# Altium PCB adau1979-fpga.PcbDoc (part 1 of 10)
Units mil, origin at the board's own origin, x right, y up, seen from the top; angles counter-clockwise.
Board outline 7874.02 x 9055.12 mil, 4 copper layers (Top Layer, GND, POWER, Bottom Layer), stack 23.756 mil thick; 636 components, 457 nets, 2015 pads, 4184 vias.
Unrouted connection lines stored in the file: 10.
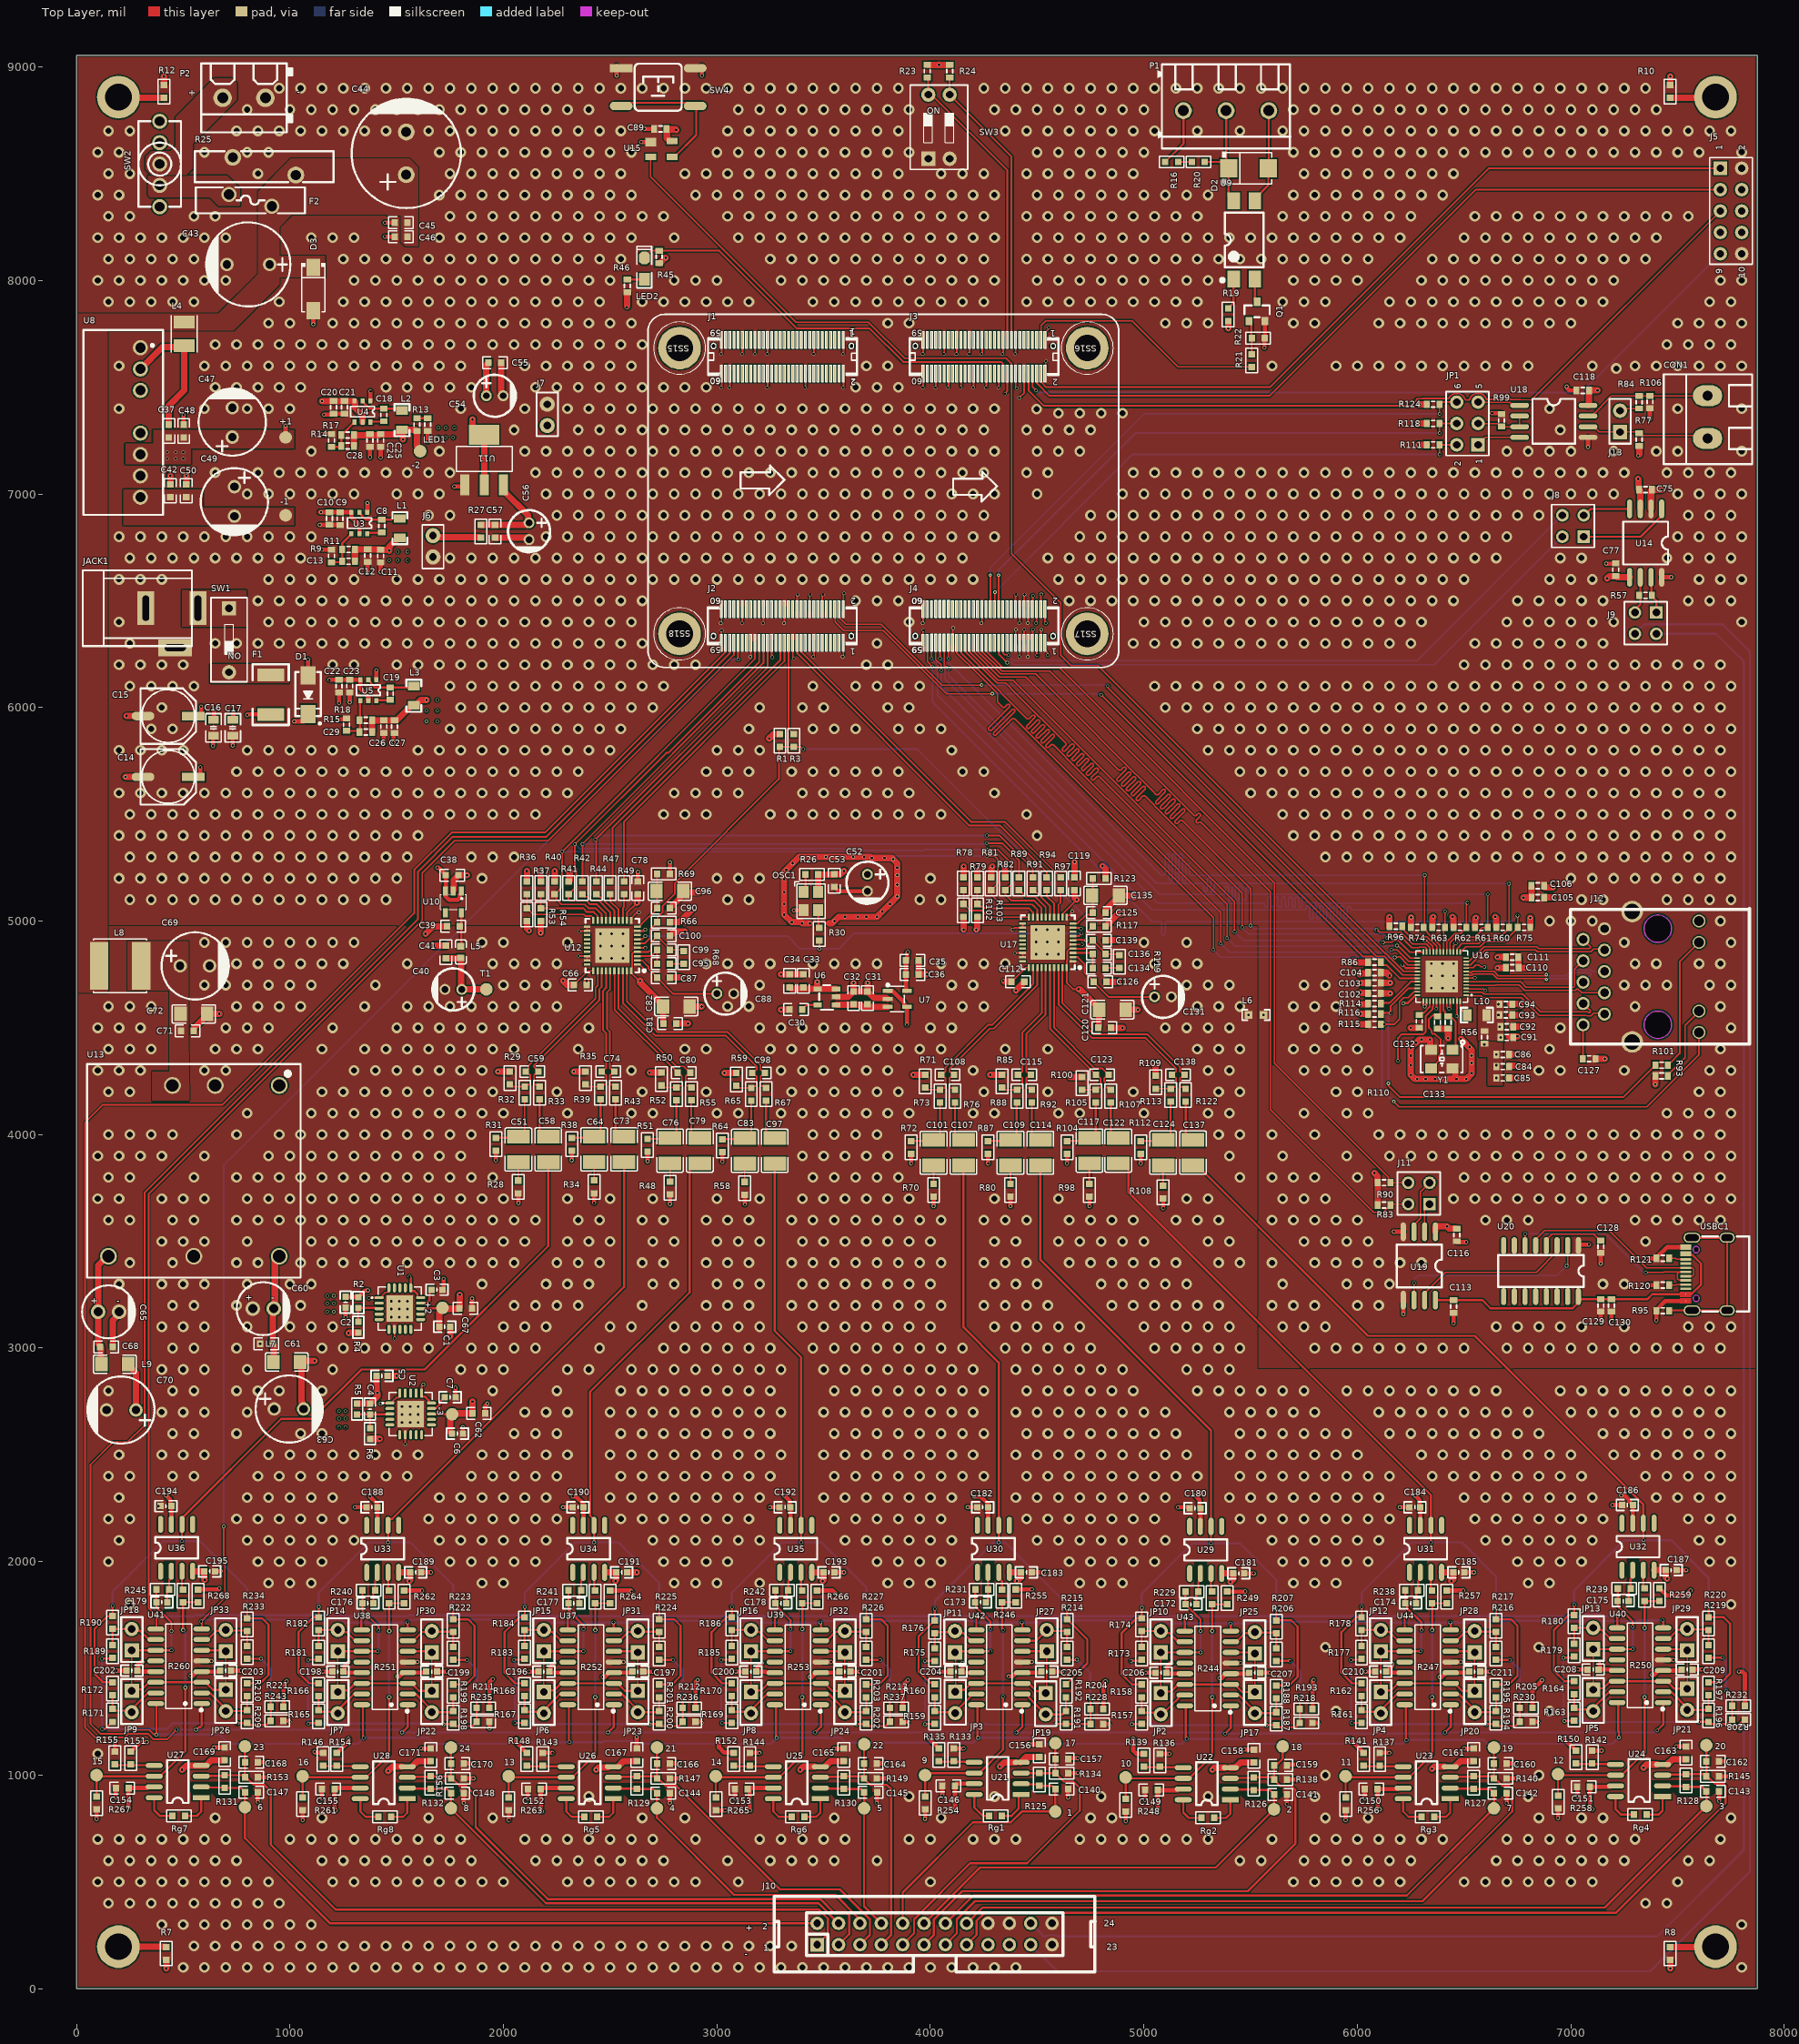
[diagram p0: Top Layer view]
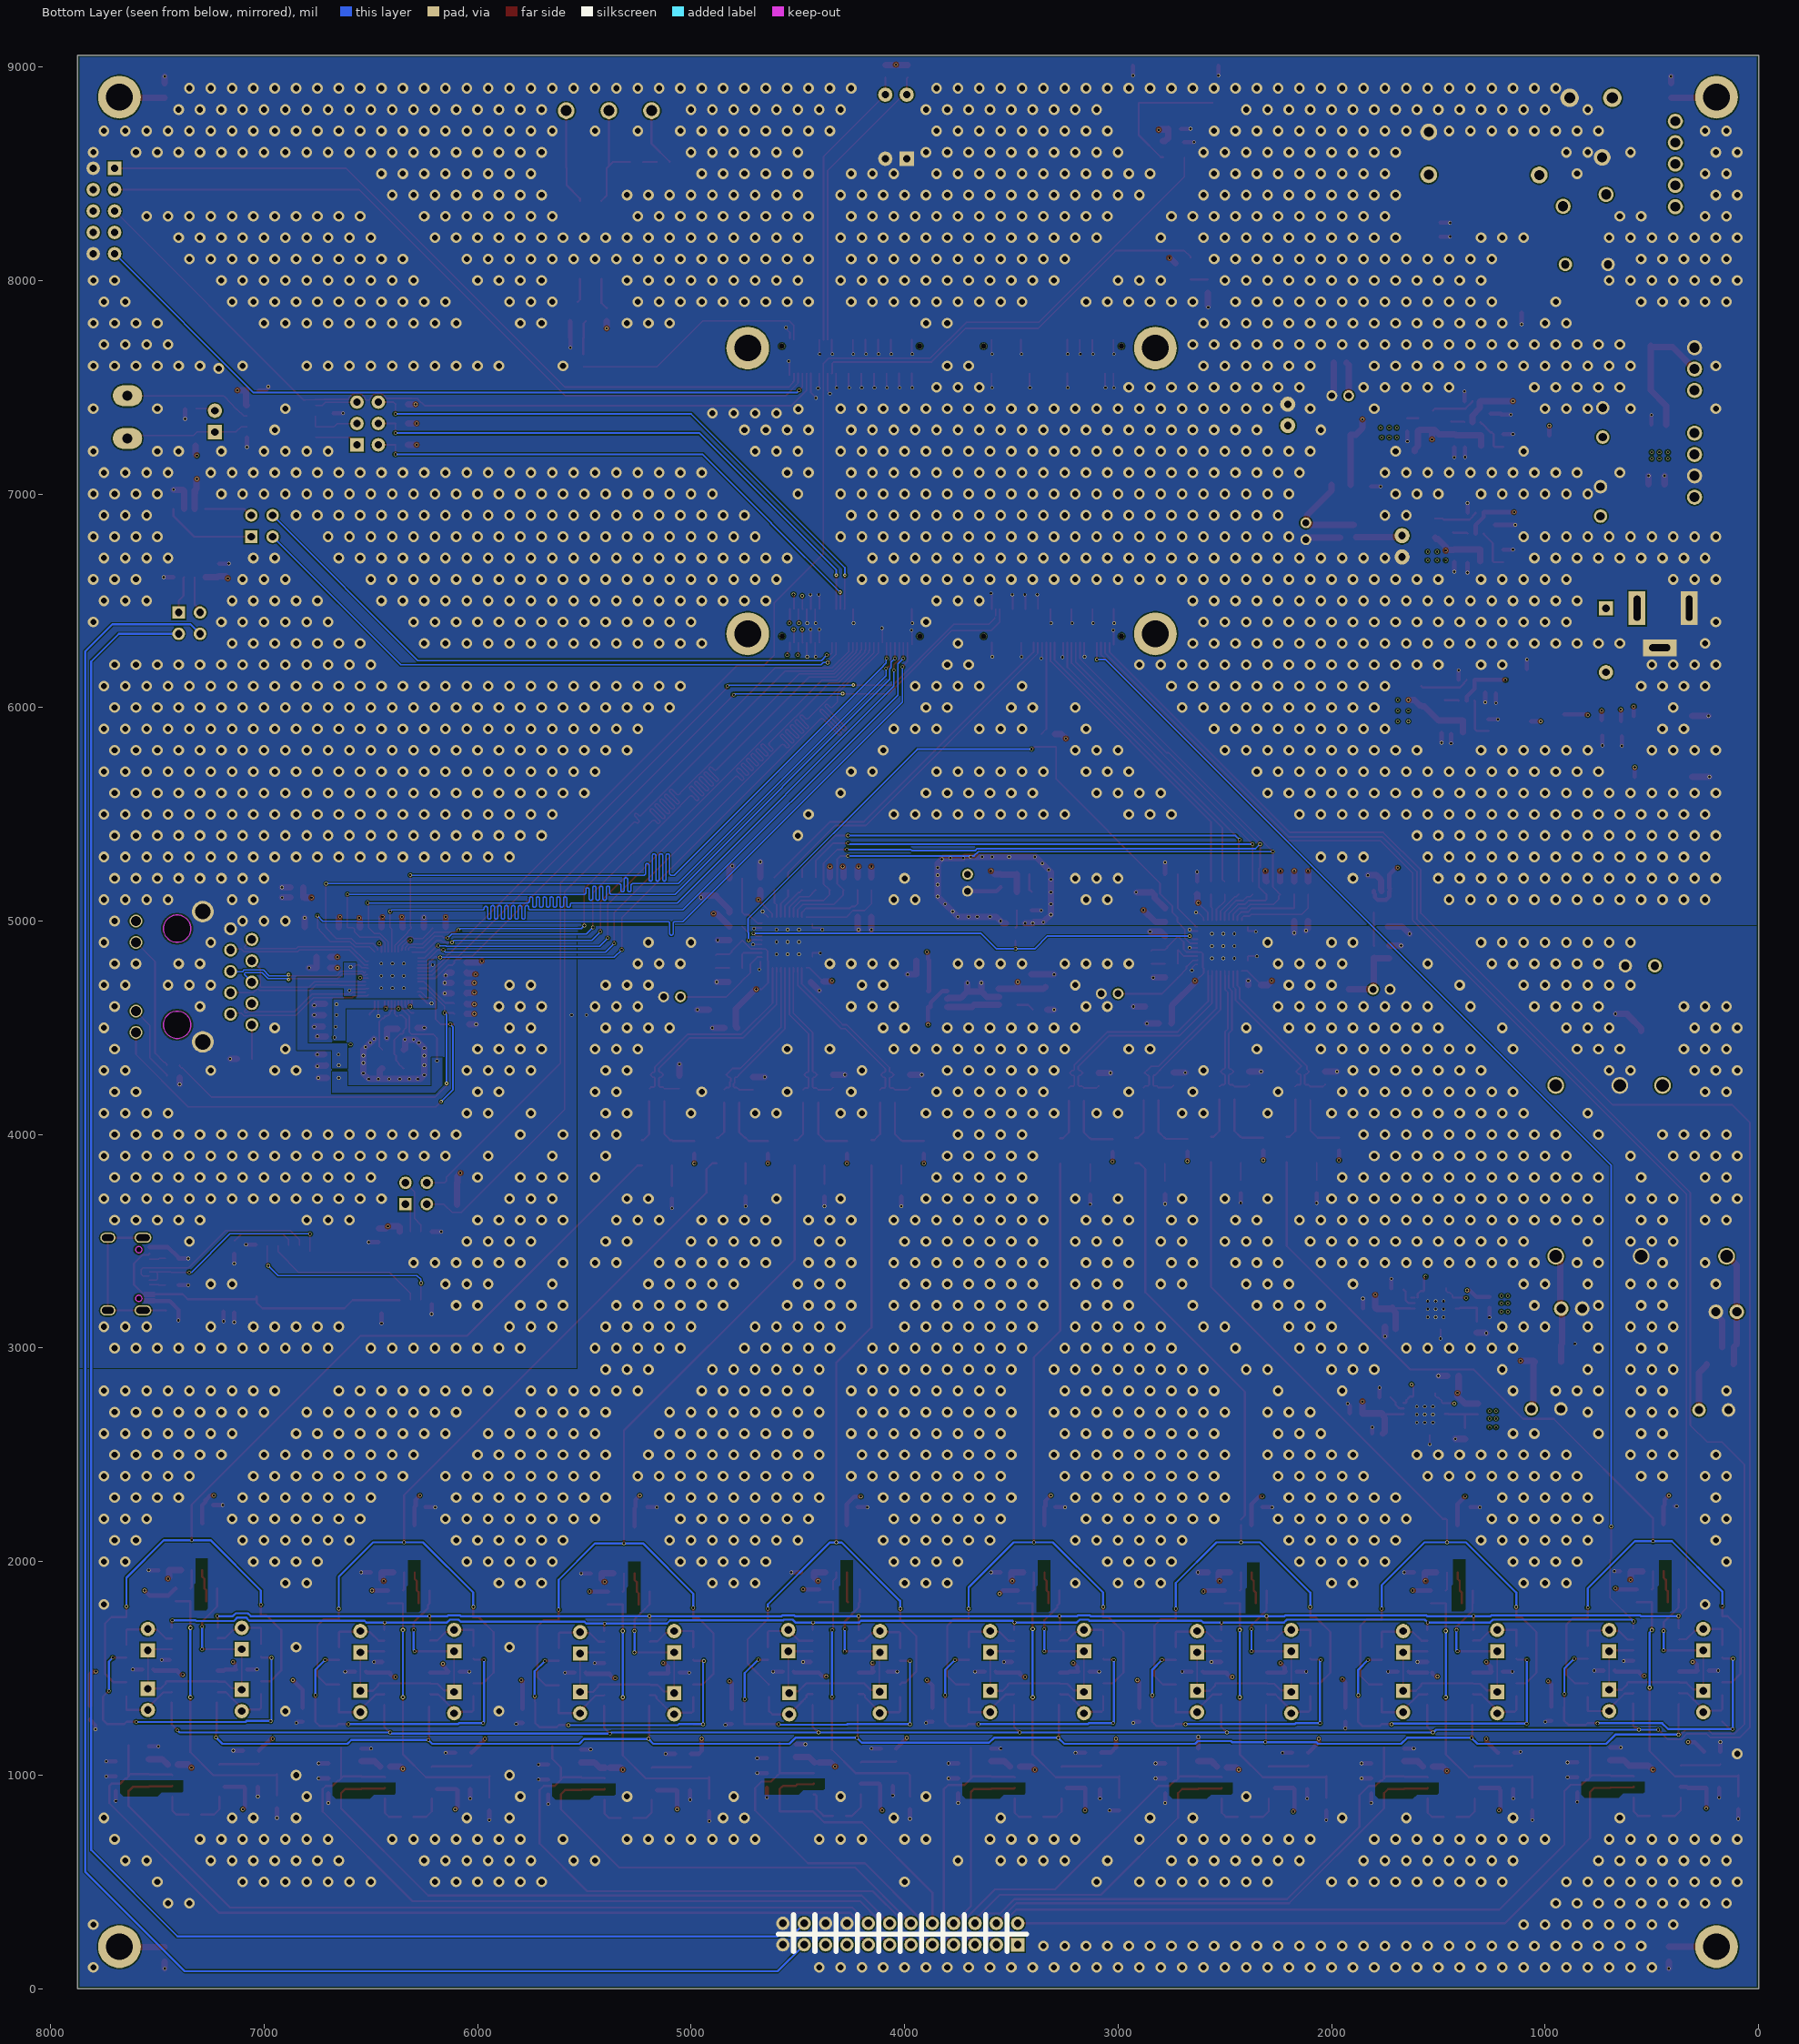
[diagram p1: Bottom Layer view, seen from below]
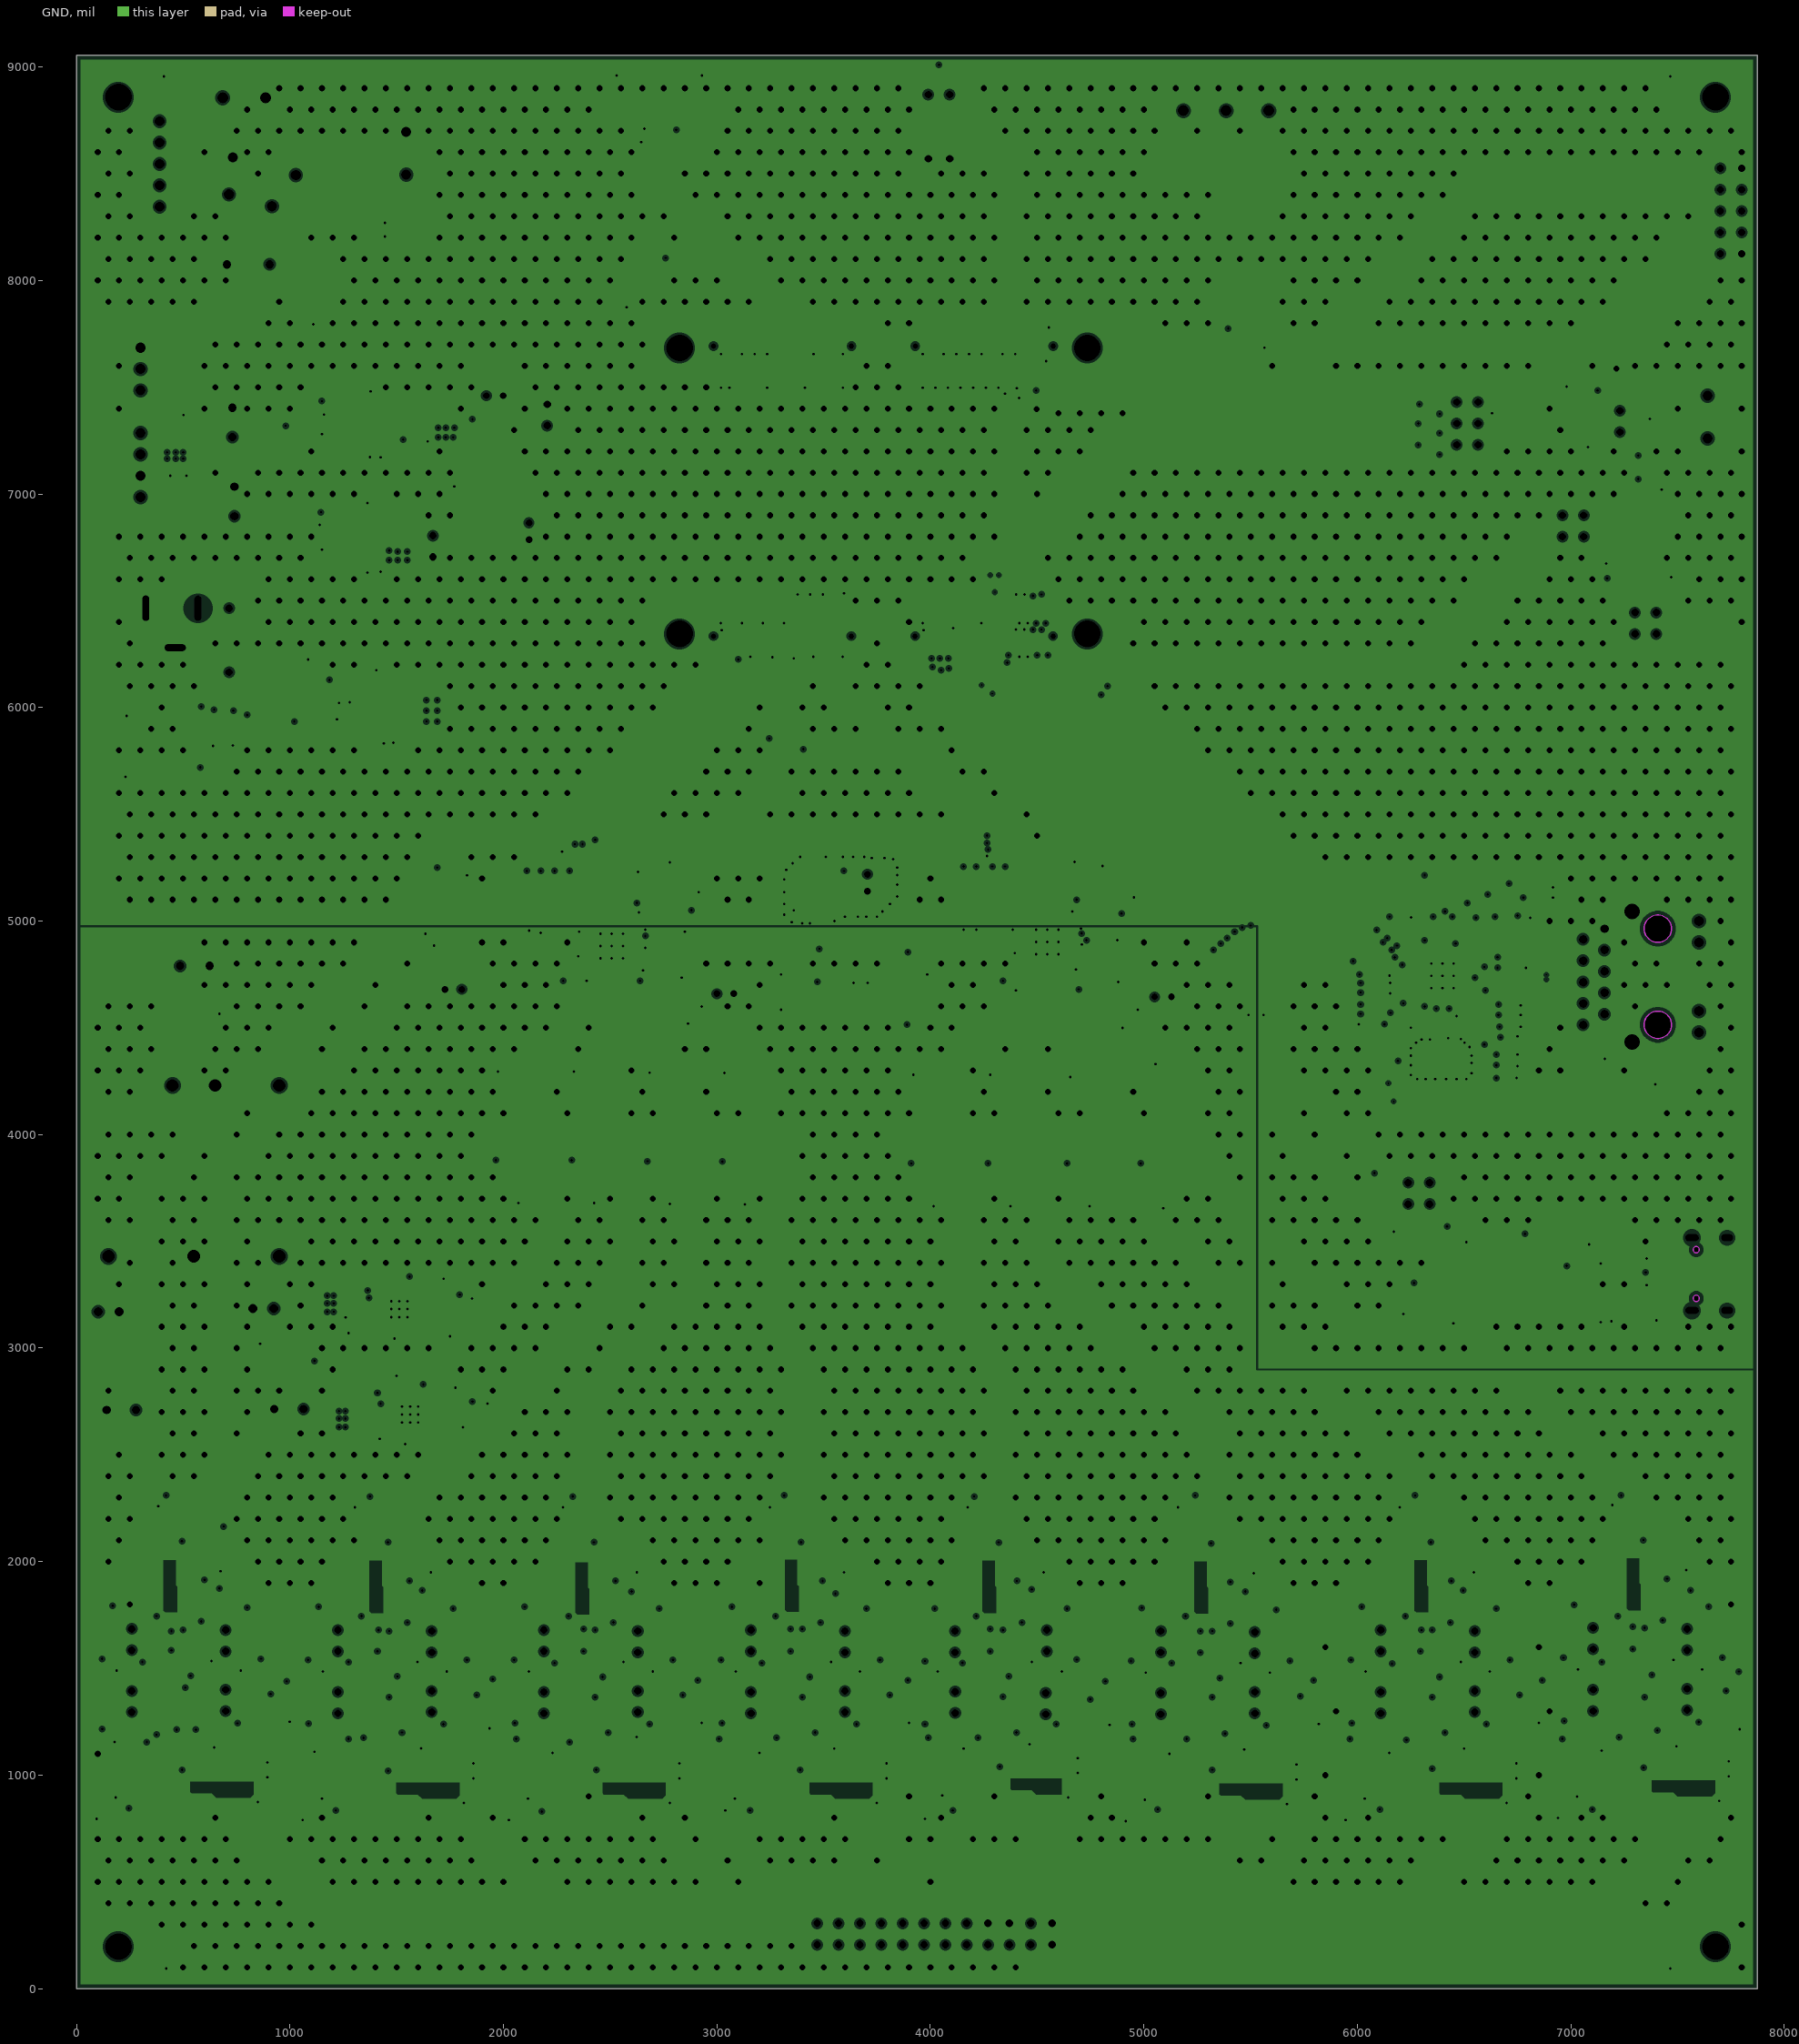
[diagram p2: GND, clearances drawn from the general rule]
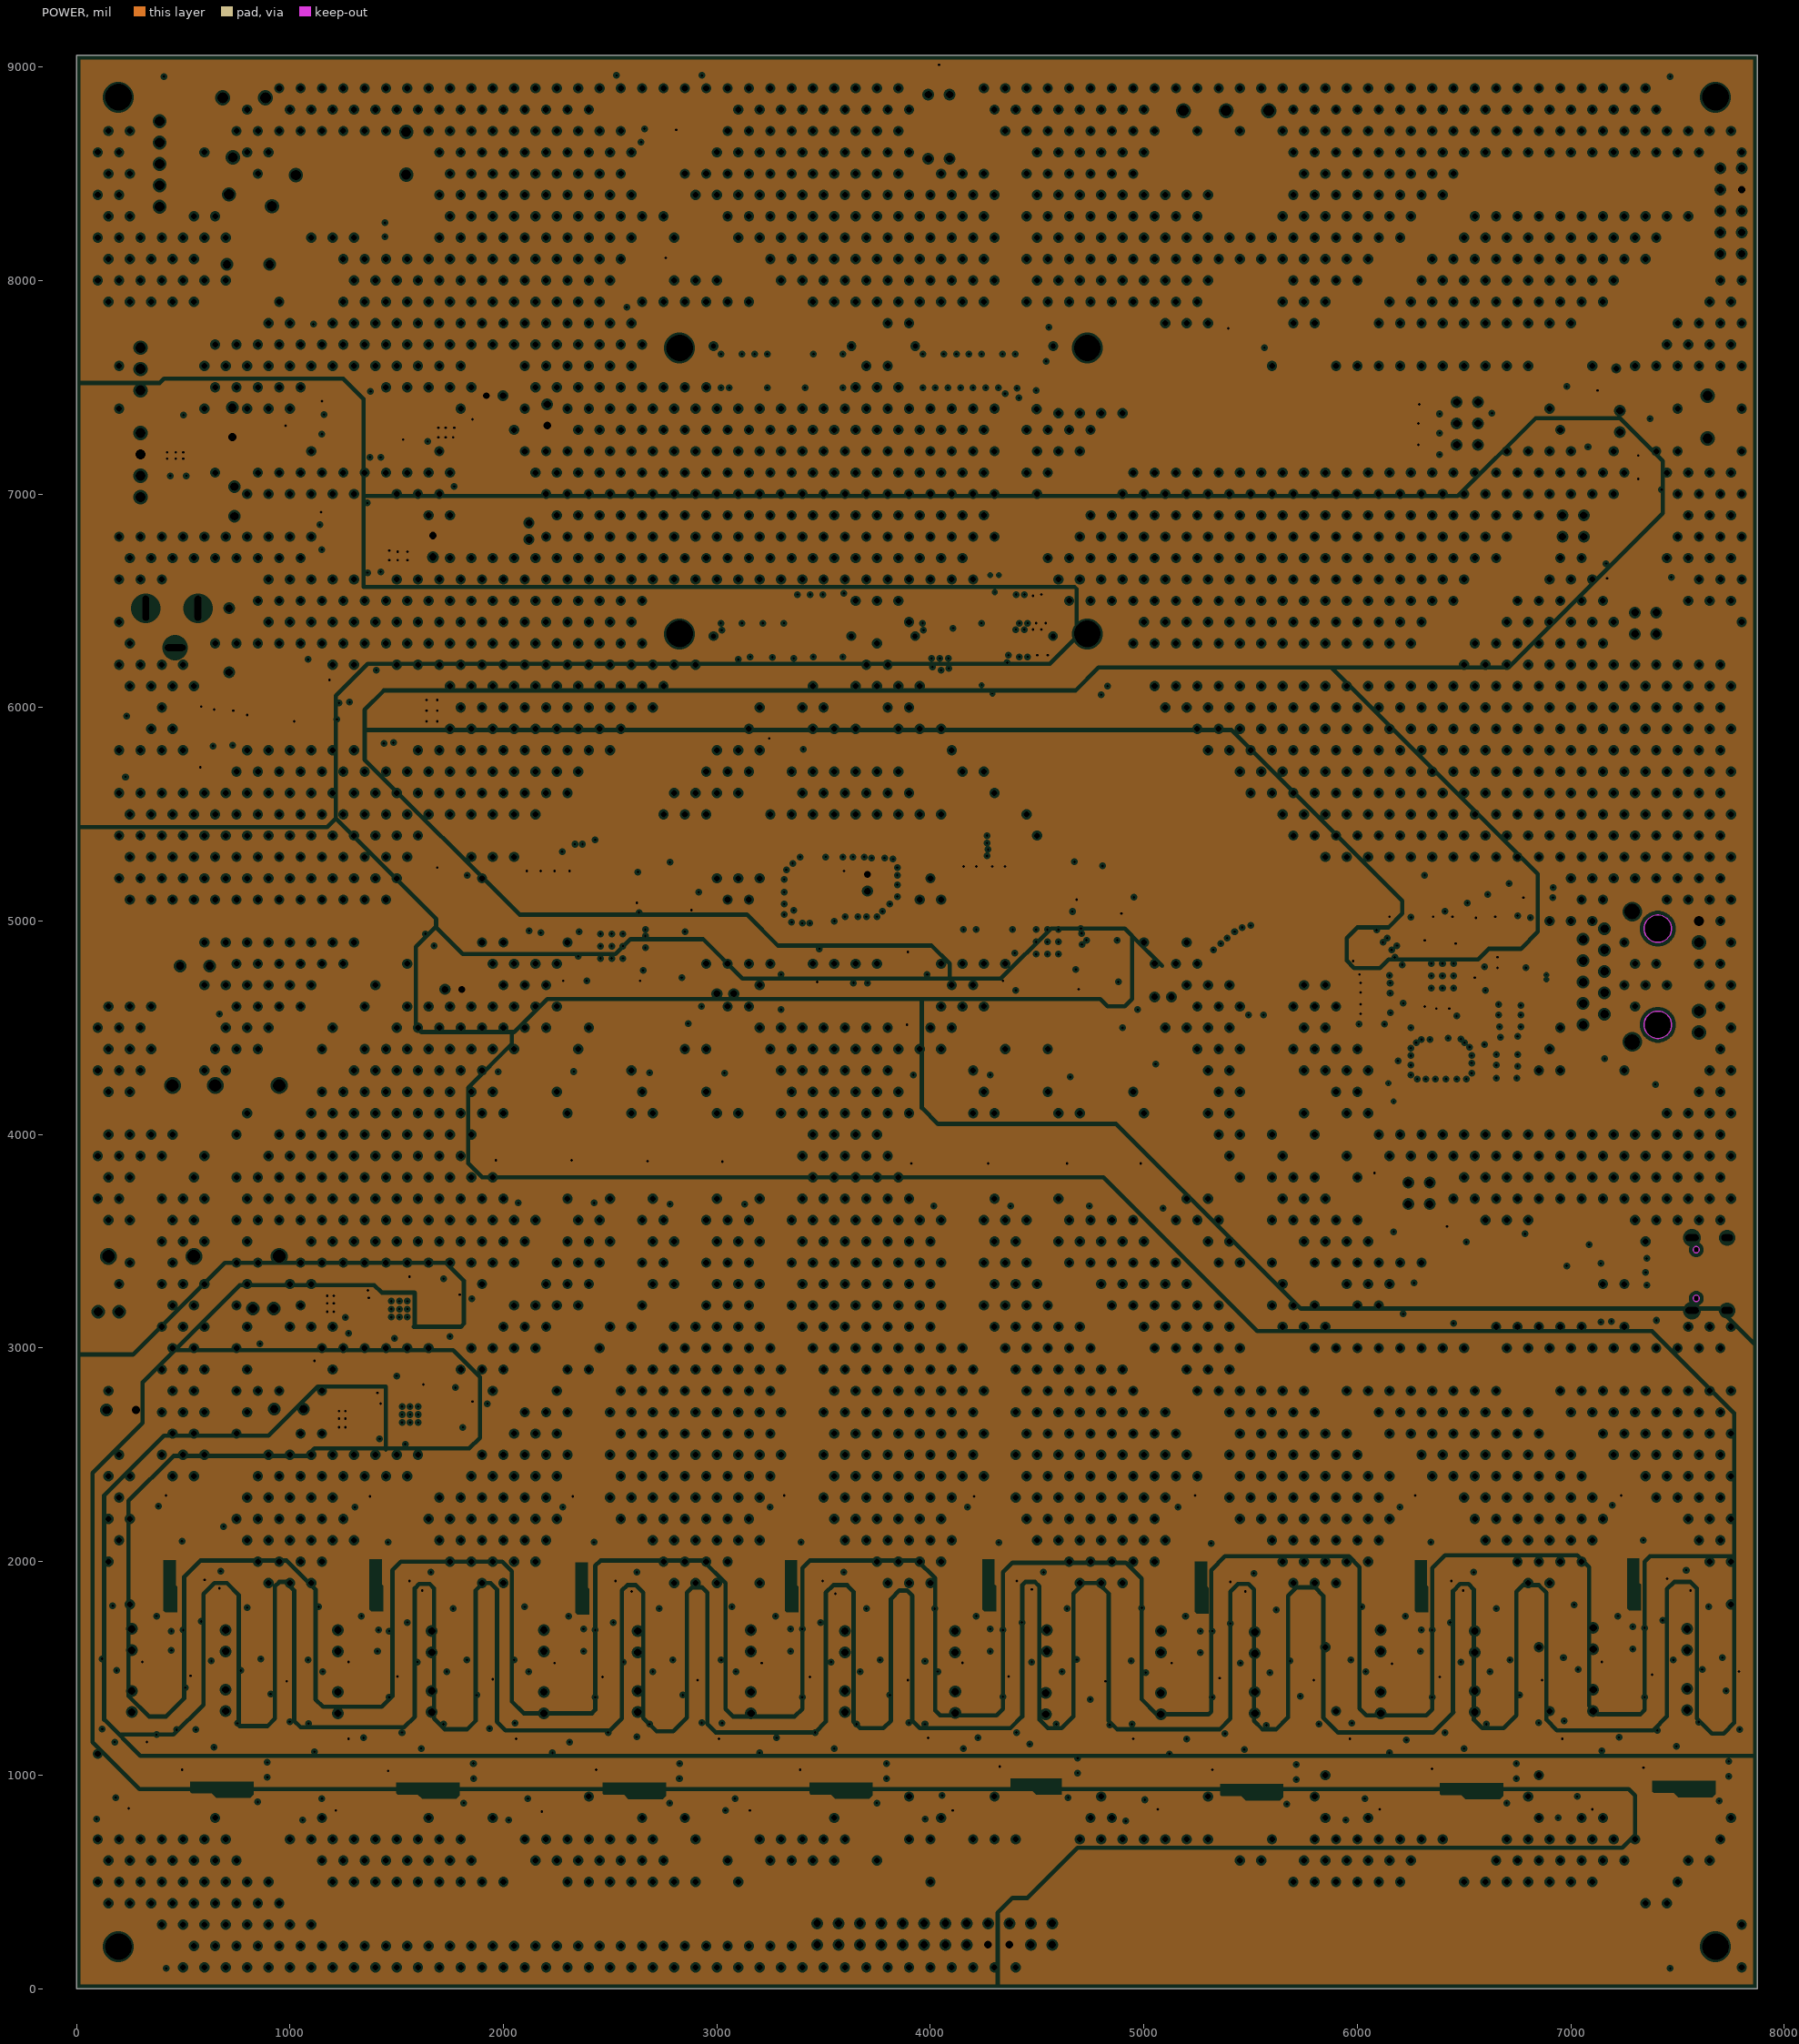
[diagram p3: POWER, clearances drawn from the general rule]

## Layer stack, top to bottom
Top Solder: solder mask 0.4, Solder Resist, Dk 3.5
Top Layer: signal copper 1.4
Dielectric 2: prepreg 2.8, PP-006, Dk 4.1
GND: plane copper 1.378, net (Multiple Nets)
Dielectric 1: dielectric 12.6, FR-4, Dk 4.8
POWER: plane copper 1.378, net (Multiple Nets)
Dielectric 3: prepreg 2.8, PP-006, Dk 4.1
Bottom Layer: signal copper 1.4
Bottom Solder: solder mask 0.4, Solder Resist, Dk 3.5

## Board outline
0,0 0,9055.12 7874.02,9055.12 7874.02,0

## Design rules (kind name [scope] priority, off if disabled: settings)
AssemblyTestPointUsage 2284ea57-458d-47d5-8d41-4f903e3b5c5f [All] p1:
AssemblyTestpoint 0b7be17f-e431-45da-92ab-2d8fefdc81cb [All] p1: testpointundercomponent=TRUE minsize=40 maxsize=100 preferedsize=60 minholesize=0 maxholesize=40 preferedholesize=32 testpointgrid=1 usegrid=TRUE gridtolerance=0.01 allowsidetop=TRUE allowsidebottom=TRUE
BoardOutlineClearance edf1632b-4de3-492e-8ec9-d665e94dc87a [All] p1: gap=10 ignorepadtopadclearanceinfootprint=FALSE except(0: Arc-SplitContinuation Track-SplitContinuation SMDPad-SplitContinuation THPad-SplitContinuation Via-SplitContinuation Fill-SplitContinuation Poly-SplitContinuation Region-SplitContinuation Text-SplitContinuation)
Clearance [All] p1: gap=6 ignorepadtopadclearanceinfootprint=TRUE except(8: THPad-THPad)
Clearance 7a459aeb-87d2-4b7b-ae39-eb6e064676f2 [All] p2: gap=1 ignorepadtopadclearanceinfootprint=TRUE
ComponentClearance 4c50f813-e942-423f-b143-1b9c3902804f [All] p1: gap=0 collisioncheckmode=3 verticalgap=0 showdistances=FALSE
DiffPairsRouting DiffPair_DiffPairsRouting [InDifferentialPair ('NewDifferentialPair1')] p1: maxlimit=6 minlimit=6 mostfreqgap=6 toplayer_minwidth=6 toplayer_maxwidth=6 toplayer_prefwidth=6 bottomlayer_minwidth=6 bottomlayer_maxwidth=6 bottomlayer_prefwidth=6 maxuncoupledlength=500
DiffPairsRouting DiffPair_DiffPairsRouting_1 [InDifferentialPair ('NewDifferentialPair1')] p2: maxlimit=6 minlimit=6 mostfreqgap=6 toplayer_minwidth=6 toplayer_maxwidth=6 toplayer_prefwidth=6 bottomlayer_minwidth=6 bottomlayer_maxwidth=6 bottomlayer_prefwidth=6 maxuncoupledlength=500
DiffPairsRouting DiffPair_DiffPairsRouting_2 [InDifferentialPair ('NewDifferentialPair1')] p3: maxlimit=10 minlimit=10 mostfreqgap=10 toplayer_minwidth=15 toplayer_maxwidth=15 toplayer_prefwidth=15 bottomlayer_minwidth=15 bottomlayer_maxwidth=15 bottomlayer_prefwidth=15 maxuncoupledlength=500
DiffPairsRouting 27806ee6-c327-4fc4-a858-eb2f0cb3da28 [All] p4: maxlimit=10 minlimit=10 mostfreqgap=10 toplayer_minwidth=6 toplayer_maxwidth=15 toplayer_prefwidth=15 bottomlayer_minwidth=6 bottomlayer_maxwidth=15 bottomlayer_prefwidth=15 maxuncoupledlength=500
FabricationTestPointUsage dcf9f27c-776a-47db-83d0-6bb1faf551ae [All] p1: valid=0 allowmultiple=FALSE
FabricationTestpoint 1e284342-c079-4508-8fbc-de4790610cb9 [All] p1: side=3 testpointundercomponent=TRUE minsize=40 maxsize=100 preferedsize=60 minholesize=0 maxholesize=40 preferedholesize=32 testpointgrid=1 allowsidetop=TRUE allowsidebottom=TRUE usegrid=TRUE gridtolerance=0.01
FanoutControl 5fe8f4da-e8e7-4d3a-b4b1-0d5bb53e4f31 [All] p5: bgadir=Out bgaviamode=Centered fanoutstyle=Auto fanoutdirection=Alternating viagrid=1 // Fanout_Default (Default Rule)
Height 02e618ed-2884-44db-8a87-c27f6234f22e [All] p1: minheight=0 maxheight=1000 prefheight=500
HoleSize 4768c6c1-5437-456e-baa1-3b25861ffbf5 [All] p1: absolutevalues=TRUE maxlimit=500 minlimit=1 maxpercent=80.000 minpercent=20.000
HoleToHoleClearance 3a4b6ee1-4156-48f5-a7b2-0b459da9bebf [All] p1: gap=10 allowstackedmicrovias=TRUE
LayerPairs 3a5810c5-c24a-469e-a94a-7c3e4e0f7d9c [All] p1: enforce=TRUE
MatchedLengths DiffPair_MatchedLengths [InDifferentialPair ('NewDifferentialPair1')] p1: tolerance=1000 checknetsindiffpair=FALSE checkdiffpairvsdiffpair=TRUE checkxsignals=TRUE checkothers=TRUE
MatchedLengths 1 [All] p2 off: tolerance=1000 checknetsindiffpair=FALSE checkdiffpairvsdiffpair=TRUE checkxsignals=TRUE checkothers=TRUE
MatchedLengths DiffPair_MatchedLengths_1 [InDifferentialPair ('NewDifferentialPair1')] p3: tolerance=1000 checknetsindiffpair=FALSE checkdiffpairvsdiffpair=TRUE checkxsignals=TRUE checkothers=TRUE
MatchedLengths DiffPair_MatchedLengths_2 [InDifferentialPair ('NewDifferentialPair1')] p4: tolerance=1000 checknetsindiffpair=FALSE checkdiffpairvsdiffpair=TRUE checkxsignals=TRUE checkothers=TRUE
MinimumSolderMaskSliver a1f60ae1-69ae-4ebb-8b2c-252be2f5e994 [All] p1: minsoldermaskwidth=4
NetAntennae a77b2740-200a-443d-bfb8-eeb967c38826 [All] p1: netantennaetolerance=0
PasteMaskExpansion dbf829cc-816e-4ffe-be0c-3511519ada79 [All] p1: expansion=0
PlaneClearance [All] p1: clearance=10
PlaneConnect [All] p1: pad.planeconnectstyle=Relief pad.reliefexpansion=8 pad.reliefentries=4 pad.reliefconductorwidth=12 pad.reliefairgap=8 via.planeconnectstyle=Direct via.reliefexpansion=8 via.reliefentries=4 via.reliefconductorwidth=12 via.reliefairgap=8
PolygonConnect [All] p1: connectstyle=Direct reliefconductorwidth=15 reliefentries=4 polygonreliefangle="90 Angle" airgapwidth=10
RoutingCorners 6f068558-8545-46d6-99e1-7ac275715c58 [All] p1: cornerstyle=45-Degree minsetback=100 maxsetback=100
RoutingTopology cacd87a7-2bba-4389-b854-dfe316a1d841 [All] p1: topology=Shortest
RoutingVias b0d978ff-3d12-4dd6-b35e-53ea7649a838 [All] p1: holewidth=8 width=16 viastyle="Through Hole" minholewidth=6 minwidth=8 maxholewidth=40 maxwidth=100
SilkToSilkClearance ac1b98eb-605f-44fa-8dc2-80e6ec5ca8dd [All] p1: silktosilkclearance=0
SilkToSolderMaskClearance 46d8649f-e36a-41cc-8266-7c170f7f3035 [IsPad] p1: minsilkscreentomaskgap=0 clearancetoexposedcopper=TRUE
SolderMaskExpansion d6f8bba1-fefc-4b9c-a2fd-0bc8fbbda4dd [All] p1: expansion=4 istentingtop=FALSE
SupplyNets "Schematic Supply Nets_12" [InNet('+12V_d')] p1: voltage=0.000
SupplyNets "Schematic Supply Nets_10" [InNet('-12V')] p2: voltage=0.000
SupplyNets "Schematic Supply Nets_15" [InNet('GND')] p3: voltage=0.000
SupplyNets "Schematic Supply Nets_14" [InNet('+15V')] p4: voltage=0.000
SupplyNets "Schematic Supply Nets_13" [InNet('VBIAS_1V5_RAW')] p5: voltage=0.000
SupplyNets "Schematic Supply Nets_11" [InNet('AVDD')] p6: voltage=0.000
SupplyNets "Schematic Supply Nets_9" [InNet('DVDD10_PS')] p7: voltage=0.000
SupplyNets "Schematic Supply Nets_8" [InNet('VBIAS_1V5')] p8: voltage=0.000
SupplyNets "Schematic Supply Nets_7" [InNet('AGND')] p9: voltage=0.000
SupplyNets "Schematic Supply Nets_6" [InNet('1V8')] p10: voltage=0.000
SupplyNets "Schematic Supply Nets_5" [InNet('ADVDD10_PS')] p11: voltage=0.000
SupplyNets "Schematic Supply Nets_4" [InNet('+12V')] p12: voltage=0.000
SupplyNets "Schematic Supply Nets_3" [InNet('5V_USB')] p13: voltage=0.000
SupplyNets "Schematic Supply Nets_2" [InNet('+5')] p14: voltage=0.000
SupplyNets "Schematic Supply Nets_1" [InNet('-15V')] p15: voltage=0.000
SupplyNets "Schematic Supply Nets" [InNet('IOVDD')] p16: voltage=0.000
UnpouredPolygon 50a078ee-1471-49dd-9b50-e47f498fe0e2 [All] p1:
Width [All] p1: maxlimit=60 minlimit=5 preferedwidth=10
9 further rules are at their usual default settings.

## Classes and differential pairs
polygon class PolygonClass_1: -12V_D_L01_P011
differential pair NewDifferentialPair1: +PS_P2 -PS_N2
differential pair AIN8: +AIN8_P -AIN8_N
differential pair AIN7: +AIN7_P -AIN7_N
differential pair AIN6: +AIN6_P -AIN6_N
differential pair AIN5: +AIN5_P -AIN5_N
differential pair AIN4: +AIN4_P -AIN4_N
differential pair AIN3: +AIN3_P -AIN3_N
differential pair AIN2: +AIN2_P -AIN2_N
differential pair AIN1: +AIN1_P -AIN1_N

## Components (designator, comment, footprint, x,y, rotation, side; value= is the part's Value field where it differs from the comment)
1 "TEST POINT" TEST 4585,830 r90 top
2 "TEST POINT" TEST 5609.41,840 r90 top
3 "TEST POINT" TEST 7634.41,855 r90 top
4 "TEST POINT" TEST 2719.41,845 r90 top
5 "TEST POINT" TEST 3689.41,845 r90 top
6 "TEST POINT" TEST 789.41,850 r90 top
7 "TEST POINT" TEST 6639.41,845 r90 top
8 "TEST POINT" TEST 1754.41,845 r90 top
9 "TEST POINT" TEST 3975,1000 r90 top
10 "TEST POINT" TEST 4914.41,990 r0 top
11 "TEST POINT" TEST 5944.41,995 r0 top
12 "TEST POINT" TEST 6939.41,1005 r0 top
13 "TEST POINT" TEST 2024.41,995 r0 top
14 "TEST POINT" TEST 2994.41,995 r0 top
15 "TEST POINT" TEST 94.41,1000 r0 top
16 "TEST POINT" TEST 1059.41,995 r0 top
17 "TEST POINT" TEST 4585,1150 r0 top
18 "TEST POINT" TEST 5650,1135 r0 top
19 "TEST POINT" TEST 6639.41,1130 r0 top
20 "TEST POINT" TEST 7634.41,1140 r0 top
21 "TEST POINT" TEST 2719.41,1130 r0 top
22 "TEST POINT" TEST 3690,1145 r0 top
23 "TEST POINT" TEST 789.41,1135 r0 top
24 "TEST POINT" TEST 1754.41,1130 r0 top
+1 "TEST POINT" TEST 980,7265 r0 top
+2 "TEST POINT" TEST 1714.41,3188.48 r270 top
-1 "TEST POINT" TEST 980,6900 r0 top
-2 "TEST POINT" TEST 1610,7200.47 r270 top
-3 "TEST POINT" TEST 1760,2690 r270 top
C1 "10uF" "C 0603_L" 1725,3100 r0 top
C2 "47uF" "C 0603_L" 1260.59,3214.39 r270 top
C3 "1uF" "C 0603_L" 1688.83,3273.49 r0 top
C4 "10nF" "C 0603_L" 1375,2714.41 r270 top
C5 "47uF" "C 0603_L" 1430.59,2870 r0 top
C6 "10uF" "C 0603_L" 1784.41,2600 r0 top
C7 "1uF" "C 0603_L" 1750,2770 r0 top
C8 "0.1uF" 0603 1430,6850 r270 top
C9 "10uF" 0603 1235,6884.53 r90 top
C10 "0.1uF" 0603 1185,6885 r90 top
C11 "0.1uF" 0603 1425,6710 r90 top
C12 "22uF" 0603 1363.78,6712.13 r90 top
C13 "NC C0603" 0603 1275,6685 r180 top
C14 "100uF/25V" "CM D(6.3*5.4)" 430,5675 r0 top
C15 "NC CAP100" "CM D(6.3*5.4)" 430,5960 r0 top
C16 "10uF" "C 0805_L" 642.16,5905 r90 top
C17 "0.1uF" "C 0805_L" 732.16,5905 r90 top
C18 "0.1uF" 0603 1440,7370.47 r270 top
C19 "0.1uF" 0603 1470,6065 r270 top
C20 "10uF" 0603 1205,7405.47 r90 top
C21 "0.1uF" 0603 1255,7405.47 r90 top
C22 "10uF" 0603 1230,6100 r90 top
C23 "0.1uF" 0603 1280,6099.53 r90 top
C24 "0.1uF" 0603 1375,7250.94 r90 top
C25 "22uF" 0603 1425,7250.47 r90 top
C26 "0.1uF" 0603 1440,5910 r90 top
C27 "22uF" 0603 1490,5910 r90 top
C28 "NC C0603" 0603 1270,7225.47 r180 top
C29 "NC C0603" 0603 1355,5885 r180 top
C30 "100nf" 0603C#1 3370,4585 r180 top
C31 "100nf" 0603C#1 3705,4640 r270 top
C32 "1uf" 0603C#1 3640,4640 r270 top
C33 "1uf" 0603C#1 3405,4720 r270 top
C34 "100nf" 0603C#1 3340,4720 r270 top
C35 "100nf" 0603C#1 3915,4815 r180 top
C36 "1uf" 0603C#1 3915,4750 r180 top
C37 "1nf" 0603C#1 432.5,7295 r270 top
C38 "4.7uf" 0603C#1 1760,5215 r180 top
C39 "4.7uf" 0603C#1 1765,4975 r0 top
C40 "10uF" 5x11mm 1765,4680 r180 top
C41 "0.1uf" 0603C#1 1730,4855 r270 top
C42 "1nf" 0603C#1 440,7015 r270 top
C43 "330uf" CAP-TH_BD10.0-P5.00-D1.0-FD 805,8075 r180 top
C44 "680uF" CAP-TH_BD13.0-P5.00-D1.2-FD 1545,8595 r90 top
C45 "4.7uf" 0603C#1 1520,8270 r180 top
C46 "10uf" 0603C#1 1520,8205 r180 top
C47 "100uF" CAP-TH_BD8.0-P3.50-D0.6-FD 730,7335 r90 top
C48 "10uf" 0603C#1 502.5,7295 r90 top
C49 "100uF" CAP-TH_BD8.0-P3.50-D0.6-FD 740,6965 r270 top
C50 "10uf" 0603C#1 515,7015 r90 top
C51 "10uF" C1210 2070,3930 r270 top
C52 "10uF" 5x11mm 3705,5178.74 r270 top
C53 "0.1uf" 0603C#1 3550,5188.74 r90 top
C54 "10u" 5x11mm 1960,7460 r0 top
C55 "0.1u" 0603C#1 1960.08,7615 r0 top value=104
C56 "10u" 5x11mm 2120,6825 r270 top
C57 "0.1u" 0603C#1 1960,6825 r270 top value=104
C58 "10uF/0Ω" C1210 2210,3930 r90 top value=10uF
C59 "DNP" 0603C#1 2135,4295 r180 top
C60 "10uF" CAP-TH_BD6.3-P2.50-D0.6-FD 875,3185 r0 top
C61 "0.1uf" 0603C#1 890,3020 r180 top
C62 "0.1uf" 0603C#1 1885,2695 r0 top
C63 "100uF" CAP-TH_BD8.0-P3.50-D0.6-FD_1 995,2715 r0 top
C64 "10uF" C1210 2425,3930.08 r270 top
C65 "10uF" CAP-TH_BD6.3-P2.50-D0.6-FD 150.79,3170 r0 top
C66 "0.1uf" 0603C#1 2360,4700 r180 top
C67 "0.1uf" 0603C#1 1822.96,3186.86 r180 top
C68 "0.1uf" 0603C#1 140,3005 r180 top
C69 "100uF" CAP-TH_BD8.0-P3.50-D0.6-FD_1 555,4790 r0 top
C70 "100uF" CAP-TH_BD8.0-P3.50-D0.6-FD_1 210,2710 r180 top
C71 "0.1uf" 0603C#1 520,4485 r0 top
C72 "4.7uF" C1206 550,4565 r180 top
C73 "10uF/0Ω" C1210 2565,3930.08 r270 top value=10uF
C74 "DNP" 0603C#1 2490,4295.08 r180 top
C75 "0.1uF" 0603 7350,7020 r180 top
C76 "10uF" C1210 2780,3925 r270 top
C77 "0.1uF" 0603 7210,6645 r270 top
C78 "0.1uf" 0603C#1 2630,5155.08 r90 top
C79 "10uF/0Ω" C1210 2920,3925 r270 top value=10uF
C80 "DNP" 0603C#1 2845,4290 r180 top
C81 "0.1uf" 0603C#1 2780,4520 r180 top
C82 "10uF" C1206 2810,4600 r180 top
C83 "10uF" C1210 3130.74,3923.62 r270 top
C84 "0.1uF" 0603 6680,4318.11 r180 top
C85 "0.1uF" 0603 6680,4265 r180 top
C86 "0.1uF" 0603 6680.47,4375 r180 top
C87 "0.1uf" 0603C#1 2750,4735 r0 top
C88 "10uF" 5x11mm 3040,4660 r0 top
C89 "0.1uF" 0603 2735,8710 r0 top
C90 "0.1uf" 0603C#1 2750,5060 r180 top
C91 "22uF" 0603 6700,4455 r180 top
C92 "0.1uF" 0603 6700,4505 r180 top
C93 "0.1uF" 0603 6695,4560 r180 top
C94 "0.1uF" 0603 6695,4610 r180 top
C95 "5600pf" 0603C#1 2750.08,4800 r0 top
C96 "10uF" C1206 2780,5140 r180 top
C97 "10uF/0Ω" C1210 3270.74,3923.62 r270 top value=10uF
C98 "DNP" 0603C#1 3195.74,4288.62 r180 top
C99 "390pf" 0603C#1 2750,4865 r0 top
C100 "0.1uf" 0603C#1 2750,4930 r0 top
C101 "10uF" C1210 4015,3915 r270 top
C102 "0.1uF" 0603 6080,4661.67 r180 top
C103 "0.1uF" 0603 6080,4710 r180 top
C104 "0.1uF" 0603 6080,4758.33 r180 top
C105 "0.1uF" 0603 6845.47,5110 r180 top
C106 "0.1uF" 0603 6845,5165 r180 top
C107 "10uF/0Ω" C1210 4155,3915 r270 top value=10uF
C108 "DNP" 0603C#1 4080,4280 r180 top
C109 "10uF" C1210 4375,3915 r270 top
C110 "0.1uF" 0603 6725,4781.22 r180 top
C111 "10uF" 0603 6724.53,4831.22 r180 top
C112 "0.1uf" 0603C#1 4410,4715 r0 top
C113 "0.1uF" 0603 6450,3195 r90 top
C114 "10uF/0Ω" C1210 4515,3915 r270 top value=10uF
C115 "DNP" 0603C#1 4440,4280 r180 top
C116 "0.1uF" 0603 6465,3530 r270 top
C117 "10uF" C1210 4745,3925 r270 top
C118 "0.1uF" 0603 7055,7485 r0 top
C119 "0.1uf" 0603C#1 4675,5175.08 r90 top
C120 "0.1uf" 0603C#1 4815,4500 r0 top
C121 "10uF" C1206 4852.7,4585 r180 top
C122 "10uF/0Ω" C1210 4880,3925 r270 top value=10uF
C123 "DNP" 0603C#1 4805,4280 r180 top
C124 "10uF" C1210 5090,3915.08 r270 top
C125 "0.1uf" 0603C#1 4790,5040 r180 top
C126 "0.1uf" 0603C#1 4795,4715 r0 top
C127 "0.1uF" 0603 7085,4355 r180 top
C128 "0.1uF" 0603 7140,3475 r90 top
C129 "0.1uF" 0603 7140,3200 r270 top
C130 "0.1uF" 0603 7190,3200 r270 top
C131 "10uF" 5x11mm 5090,4645 r0 top
C132 "18pF" 0603 6375,4525 r90 top
C133 "18pF" 0603 6425,4525 r90 top
C134 "5600pf" 0603C#1 4790.08,4780 r0 top
C135 "10uF" C1206 4820,5120 r180 top
C136 "390pf" 0603C#1 4790,4845 r0 top
C137 "10uF/0Ω" C1210 5230,3915.08 r270 top value=10uF
C138 "DNP" 0603C#1 5160,4280 r180 top
C139 "0.1uf" 0603C#1 4790,4910 r0 top
C140 "104" 0603C#1 4615,935 r0 top
C141 "104" 0603C#1 5639.41,910 r0 top
C142 "104" 0603C#1 6669.41,915 r0 top
C143 "104" 0603C#1 7664.41,925 r0 top
C144 "104" 0603C#1 2749.41,915 r0 top
C145 "104" 0603C#1 3720,920 r0 top
C146 "104" 0603C#1 4085,950 r180 top
C147 "104" 0603C#1 819.41,920 r0 top
C148 "104" 0603C#1 1784.41,915 r0 top
C149 "104" 0603C#1 5034.41,930 r180 top
C150 "104" 0603C#1 6064.41,935 r180 top
C151 "104" 0603C#1 7059.41,945 r180 top
C152 "104" 0603C#1 2144.41,935 r180 top
C153 "104" 0603C#1 3114.41,935 r180 top
C154 "104" 0603C#1 214.41,940 r180 top
C155 "104" 0603C#1 1179.41,935 r180 top
C156 "104" 0603C#1 4510,1115 r270 top
C157 "104" 0603C#1 4615,1075 r180 top
C158 "104" 0603C#2 5515,1090 r270 top
C159 "104" 0603C#1 5640,1045 r180 top
C160 "104" 0603C#1 6669.41,1055 r180 top
C161 "104" 0603C#1 6544.41,1095 r270 top
C162 "104" 0603C#1 7664.41,1065 r180 top
C163 "104" 0603C#1 7539.41,1105 r270 top
C164 "104" 0603C#1 3719.41,1055 r180 top
C165 "104" 0603C#1 3594.41,1095 r270 top
C166 "104" 0603C#1 2749.41,1055 r180 top
C167 "104" 0603C#1 2624.41,1095 r270 top
C168 "104" 0603C#1 819.41,1060 r180 top
C169 "104" 0603C#1 694.41,1100 r270 top
C170 "104" 0603C#1 1784.41,1055 r180 top
C171 "104" 0603C#1 1659.41,1095 r270 top
C172 "404" "C 0603_L" 5220,1800 r180 top
C173 "404" "C 0603_L" 4235,1810 r180 top
C174 "404" "C 0603_L" 6250,1805 r180 top
C175 "404" "C 0603_L" 7245,1815 r180 top
C176 "404" "C 0603_L" 1365,1805 r180 top
C177 "404" "C 0603_L" 2330,1805 r180 top
C178 "404" "C 0603_L" 3300,1805 r180 top
C179 "404" "C 0603_L" 400,1810 r180 top
C180 "104" "C 0603_L" 5239.41,2250 r0 top
C181 "104" "C 0603_L" 5444.41,1945 r180 top
C182 "104" "C 0603_L" 4245,2255 r0 top
C183 "104" "C 0603_L" 4450,1950 r180 top
C184 "104" "C 0603_L" 6269.41,2255 r0 top
C185 "104" "C 0603_L" 6474.41,1950 r180 top
C186 "104" "C 0603_L" 7264.41,2265 r0 top
C187 "104" "C 0603_L" 7469.41,1960 r180 top
C188 "104" "C 0603_L" 1384.41,2255 r0 top
C189 "104" "C 0603_L" 1589.41,1950 r180 top
C190 "104" "C 0603_L" 2349.41,2255 r0 top
C191 "104" "C 0603_L" 2554.41,1950 r180 top
C192 "104" "C 0603_L" 3319.41,2255 r0 top
C193 "104" "C 0603_L" 3524.41,1950 r180 top
C194 "104" "C 0603_L" 419.41,2260 r0 top
C195 "104" "C 0603_L" 624.41,1955 r180 top
C196 "104" "C 0603_L" 2189.41,1485 r0 top
C197 "104" "C 0603_L" 2629.41,1485 r180 top
C198 "104" "C 0603_L" 1224.41,1485 r0 top
C199 "104" "C 0603_L" 1664.41,1485 r180 top
C200 "104" "C 0603_L" 3159.41,1485 r0 top
C201 "104" "C 0603_L" 3599.41,1485 r180 top
C202 "104" "C 0603_L" 259.41,1490 r0 top
C203 "104" "C 0603_L" 699.41,1490 r180 top
C204 "104" "C 0603_L" 4119.41,1485 r0 top
C205 "104" "C 0603_L" 4545,1485 r180 top
C206 "104" "C 0603_L" 5080,1480 r0 top
C207 "104" "C 0603_L" 5519.41,1480 r180 top
C208 "104" "C 0603_L" 7104.41,1495 r0 top
C209 "104" "C 0603_L" 7544.41,1495 r180 top
C210 "104" "C 0603_L" 6109.41,1485 r0 top
C211 "104" "C 0603_L" 6549.41,1485 r180 top
CON1 "HDR-1X2" KF128-5.08-2P 7640,7360 r90 top
D1 "SMAJ13CA" SMA 1085,6060 r270 top
D2 "smbj33a_c224019" SMB_L4.6-W3.6-LS5.3-RD 5490,8525 r0 top
D3 "SS34" SMA_L4.4-W2.8-LS5.4-RD 1110,7960 r270 top
F1 "JK-MSMD150-24V" 1812 910,6060 r270 top
F2 "TRB300" FUSE-TH_L13.0-W3.1-P5.10-D0.8-S1.40 815,8375 r0 top
J1 "SGDBM-05-60P-H10" CONN-SMD_60P-P0.50_SGDBM-05-60P_1 2958.11,7729.56 r0 top
J2 "SGDBF-05-60P-H30" CONN-SMD_60P-P0.50_SGDBF-05-60P_1 2958.11,6296.5 r0 top
J3 "SGDBM-05-60P-H10" CONN-SMD_60P-P0.50_SGDBM-05-60P_1 3902.99,7729.56 r0 top
J4 "SGDBF-05-60P-H30" CONN-SMD_60P-P0.50_SGDBF-05-60P_1 3902.99,6296.5 r0 top
J5 "JTAG_5x2_2P54_R" HDR2.54-LI-2x5P 7750,8325 r270 top
J6 "5V" 2pin 1670,6755 r0 top
J7 "3.3V" 2pin 2205,7370 r180 top
J8 "2X2PIN" HDR2X2_B 7060,6800 r180 top
J9 "2X2PIN" HDR2X2_B 7400,6445 r270 top
J10 "Header 2X11" IDC2.54-LI-2x12P 3470,206 r0 top
J11 "2X2PIN" HDR2X2_B 6337.78,3674.34 r180 top
J12 "HY911130A" RJ45-TH_10P-P2.54-S2.54_L16.1-W21.4_HY911130A 7434.56,4822.45 r90 top
J13 "1X2PIN" HDR2.54-Y-LI-2P 7230,7340 r90 top
JACK1 "POWER JACK" DC-005 325,6465 r180 top
JP1 "Header3X2" HDR2.54-LI-2x3P 6515,7330 r90 top
JP2 "HDR-1X2" HDR2.54-Y-LI-2P 5079.41,1335 r270 top
JP3 "HDR-1X2" HDR2.54-Y-LI-2P 4116.13,1341.13 r270 top
JP4 "HDR-1X2" HDR2.54-Y-LI-2P 6109.41,1340 r270 top
JP5 "HDR-1X2" HDR2.54-Y-LI-2P 7104.41,1350 r270 top
JP6 "HDR-1X2" HDR2.54-Y-LI-2P 2189.41,1340 r270 top
JP7 "HDR-1X2" HDR2.54-Y-LI-2P 1224.41,1340 r270 top
JP8 "HDR-1X2" HDR2.54-Y-LI-2P 3159.41,1340 r270 top
JP9 "HDR-1X2" HDR2.54-Y-LI-2P 259.41,1345 r270 top
JP10 "HDR-1X2" HDR2.54-Y-LI-2P 5079.41,1625 r90 top
JP11 "HDR-1X2" HDR2.54-Y-LI-2P 4115,1625 r90 top
JP12 "HDR-1X2" HDR2.54-Y-LI-2P 6109.41,1630 r90 top
JP13 "HDR-1X2" HDR2.54-Y-LI-2P 7104.41,1640 r90 top
JP14 "HDR-1X2" HDR2.54-Y-LI-2P 1224.41,1630 r90 top
JP15 "HDR-1X2" HDR2.54-Y-LI-2P 2189.41,1630 r90 top
JP16 "HDR-1X2" HDR2.54-Y-LI-2P 3159.41,1630 r90 top
JP17 "HDR-1X2" HDR2.54-Y-LI-2P 5519.41,1340 r270 top
JP18 "HDR-1X2" HDR2.54-Y-LI-2P 259.41,1635 r90 top
JP19 "HDR-1X2" HDR2.54-Y-LI-2P 4540,1335 r270 top
JP20 "HDR-1X2" HDR2.54-Y-LI-2P 6549.41,1345 r270 top
JP21 "HDR-1X2" HDR2.54-Y-LI-2P 7544.41,1355 r270 top
JP22 "HDR-1X2" HDR2.54-Y-LI-2P 1664.41,1345 r270 top
JP23 "HDR-1X2" HDR2.54-Y-LI-2P 2629.41,1345 r270 top
JP24 "HDR-1X2" HDR2.54-Y-LI-2P 3599.41,1345 r270 top
JP25 "HDR-1X2" HDR2.54-Y-LI-2P 5519.41,1620 r90 top
JP26 "HDR-1X2" HDR2.54-Y-LI-2P 699.41,1350 r270 top
JP27 "HDR-1X2" HDR2.54-Y-LI-2P 4545,1630 r90 top
JP28 "HDR-1X2" HDR2.54-Y-LI-2P 6549.41,1625 r90 top
JP29 "HDR-1X2" HDR2.54-Y-LI-2P 7544.41,1635 r90 top
JP30 "HDR-1X2" HDR2.54-Y-LI-2P 1664.41,1625 r90 top
JP31 "HDR-1X2" HDR2.54-Y-LI-2P 2629.41,1625 r90 top
JP32 "HDR-1X2" HDR2.54-Y-LI-2P 3599.41,1625 r90 top
JP33 "HDR-1X2" HDR2.54-Y-LI-2P 699.41,1630 r90 top
L1 "3.3uH" "L 0805" 1515,6840 r270 top
L2 "3.3uH" "L 0805" 1525,7345.47 r270 top
L3 "3.3uH" "L 0805" 1580,6055 r270 top
L4 "4.7uH" 1210L 505,7750 r270 top value="15uH   0.6A"
L5 "mpz1608s221ata00" L0603 1800,4855 r270 top
L6 "10uH" "L 0603" 5525,4560 r0 top
L7 "blm31pg121sn1l" L1206 985,2935 r0 top
L8 "srn6045ta-4r7m" IND-SMD_L6.0-W6.0 205,4790 r0 top value=4.7uH
L9 "blm31pg121sn1l" L1206 180,2925 r0 top
L10 "2.2uH" "L 0805" 6560,4560 r0 top
LED1 "LED" 0603 1645,7325 r270 top
LED2 "LED" "LED 0805R" 2660,8055 r90 top
OSC1 "ot2el4c4ji-111olp-24.576m" OSC-SMD_4P-L3.2-W2.5-BL 3440,5093.74 r270 top value=24.576MHz
P1 "wj500v-5.08-03p-14-00a" CONN-TH_3P-P5.00_WJ500V-5.08-3P 5385,8795 r180 top
P2 "电源" CONN-TH_2P-P5.08 785,8855 r180 top
Q1 "2n7002,215" SOT-23_L2.9-W1.3-P1.90-LS2.4-BR 5530,7855 r270 top
R1 "10KΩ" 0603R 3295,5845 r270 top
R2 "76.8K" "R 0603_L" 1320,3212.87 r90 top
R3 "100Ω" 0603R 3360,5845 r270 top
R4 "10.2K" "R 0603_L" 1320,3097.87 r90 top
R5 "1.5M" "R 0603_L" 1315,2715 r90 top
R6 "162K" "R 0603_L" 1375,2600 r90 top
R7 "0Ω/DNP" 0603R 420.76,165 r270 top
R8 "0Ω/DNP" 0603R 7465,165 r270 top
R9 "115K" 0603 1275,6740 r180 top
R10 "0Ω/DNP" 0603R 7465,8885 r90 top
R11 "20K" 0603 1195,6710 r270 top
R12 "0Ω/DNP" 0603R 410,8885 r90 top
R13 "1K" 0603 1595,7325.47 r270 top
R14 "100K" 0603 1270,7275.47 r180 top
R15 "40.2K" 0603 1355,5940 r180 top
R16 "0Ω" 0603R 5130,8555 r0 top
R17 "30K" 0603 1195,7250.47 r270 top
R18 "30K" 0603 1265,5920 r270 top
R19 "330Ω" 0603R 5395,7840 r90 top
R20 "10K" 0603R 5255,8555 r0 top
R21 "100Ω" 0603R 5505,7625 r90 top
R22 "100KΩ" 0603R 5535,7730 r180 top
R23 "1K" 0603 3985,8980 r270 top
R24 "1K" 0603 4090,8980 r270 top
R25 "14D560K_C317812" RES-TH_L16.5-W3.5-P7.50-D0.8-S2.10 880,8535 r180 top
R26 "10K" 0603R 3445,5218.74 r0 top
R27 "0" 0603R 1895,6825 r90 top
R28 "NC" 0603R 2070,3755 r90 top
R29 "NC" 0603R 2030,4265 r270 top
R30 "33Ω" 0603R 3480,4938.74 r270 top
R31 "0Ω" 0603R 1965,3955 r90 top
R32 "2.2KΩ" 0603R 2100,4195 r90 top
R33 "2.2KΩ" 0603R 2170,4195 r90 top
R34 "NC" 0603R 2425,3755.08 r90 top
R35 "NC" 0603R 2385,4265.08 r270 top
R36 "10kΩ" 0603R 2110,5155 r270 top
R37 "10kΩ" 0603R 2175,5155 r270 top
R38 "0Ω" 0603R 2320,3955.08 r90 top
R39 "2.2KΩ" 0603R 2455,4195.08 r90 top
R40 "2kΩ/DNP" 0603R 2240,5155 r270 top
R41 "2kΩ/DNP" 0603R 2305,5155 r270 top
R42 "33Ω" 0603R 2370,5155 r90 top
R43 "2.2KΩ" 0603R 2525,4195.08 r90 top
R44 "33Ω" 0603R 2435,5155 r90 top
R45 "330R" 0603 2730,8110 r270 top
R46 "1K" 0603 2580,7975 r90 top
R47 "33Ω" 0603R 2500,5155 r90 top
R48 "NC" 0603R 2780,3750 r90 top
R49 "33Ω" 0603R 2565,5154.92 r90 top
R50 "NC" 0603R 2740,4260 r270 top
R51 "0Ω" 0603R 2675,3950 r90 top
R52 "2.2KΩ" 0603R 2810,4190 r90 top
R53 "10kΩ" 0603R 2110,5030 r270 top
R54 "10kΩ" 0603R 2175,5030 r90 top
R55 "2.2KΩ" 0603R 2880,4190 r90 top
R56 "0R" 0603 6595,4455 r90 top
R57 "120" 0603 7350,6525 r180 top
R58 "NC" 0603R 3130.74,3748.62 r90 top
R59 "NC" 0603R 3090.74,4258.62 r270 top
R60 "4.7K" 0603 6680,4970 r180 top
R61 "4.7K" 0603 6580.47,4970 r180 top
R62 "4.7K" 0603 6480,4970 r180 top
R63 "4.7K" 0603 6380,4970 r180 top
R64 "0Ω" 0603R 3025.74,3948.62 r90 top
R65 "2.2KΩ" 0603R 3160.74,4188.62 r90 top
R66 "DNP(47kΩ)" 0603R 2750,4995 r0 top
R67 "2.2KΩ" 0603R 3230.74,4188.62 r90 top
R68 "1kΩ" 0603R 2845,4830 r90 top
R69 "3kΩ" 0603R 2750,5220 r180 top
R70 "NC" 0603R 4015,3740 r90 top
R71 "NC" 0603R 3975,4250 r270 top
R72 "0Ω" 0603R 3910,3940 r90 top
R73 "2.2KΩ" 0603R 4045,4180 r90 top
R74 "4.7K" 0603 6280.47,4970 r0 top
R75 "4.7K" 0603 6780,4970 r180 top
R76 "2.2KΩ" 0603R 4115,4180 r90 top
R77 "4.7K" 0603 7320,7255 r270 top
R78 "10kΩ" 0603R 4155,5175 r270 top
R79 "10kΩ" 0603R 4220,5175 r270 top
R80 "NC" 0603R 4375,3740 r90 top
R81 "2kΩ/DNP" 0603R 4285,5175 r270 top
R82 "2kΩ/DNP" 0603R 4350,5175 r270 top
R83 "10K" 0603 6125,3670 r180 top
R84 "120" 0603 7320,7430 r90 top
R85 "NC" 0603R 4335,4250 r270 top
R86 "1.5K" 0603 6080,4806.67 r180 top
R87 "0Ω" 0603R 4270,3940 r90 top
R88 "2.2KΩ" 0603R 4405,4180 r90 top
R89 "33Ω" 0603R 4415,5175 r90 top
R90 "10K" 0603 6125,3775 r180 top
R91 "33Ω" 0603R 4480,5175 r90 top
R92 "2.2KΩ" 0603R 4475,4180 r90 top
R93 "510R" 0603 7425,4275 r0 top
R94 "33Ω" 0603R 4545,5175 r90 top
R95 "0R" 0603 7430,3175 r0 top
R96 "4.7K" 0603 6180,4975 r180 top
R97 "33Ω" 0603R 4610,5174.92 r90 top
R98 "NC" 0603R 4745,3740 r90 top
R99 "10K" 0603 6675,7345 r270 top
R100 "NC" 0603R 4710,4240 r270 top
R101 "510R" 0603 7425,4325 r0 top
R102 "10kΩ" 0603R 4155,5050 r270 top
R103 "10kΩ" 0603R 4220,5050 r90 top
R104 "0Ω" 0603R 4640,3940 r90 top
R105 "2.2KΩ" 0603R 4775,4180 r90 top
R106 "4.7K" 0603 7370,7430.47 r270 top
R107 "2.2KΩ" 0603R 4845,4180 r90 top
R108 "NC" 0603R 5090,3730 r90 top
R109 "NC" 0603R 5055,4245 r270 top
R110 "2.49K" 0603 6290,4530 r270 top
R111 "10K" 0603 6355,7230 r180 top
R112 "0Ω" 0603R 4985,3940 r90 top
R113 "2.2KΩ" 0603R 5125,4185 r90 top
R114 "4.7K" 0603 6080,4613.33 r180 top
R115 "4.7K" 0603 6080,4516.67 r180 top
R116 "4.7K" 0603 6080,4565 r180 top
R117 "DNP(47kΩ)" 0603R 4790,4975 r0 top
R118 "10K" 0603 6355,7330 r180 top
R119 "1kΩ" 0603R 4885,4810 r90 top
R120 "5.1K" 0603 7430,3295 r180 top
R121 "5.1K" 0603 7430,3420 r180 top
R122 "2.2KΩ" 0603R 5195,4185 r90 top
R123 "3kΩ" 0603R 4790,5200 r180 top
R124 "10K" 0603 6355,7420 r180 top
R125 "250Ω" 0603R 4510,980 r90 top
R126 "250Ω" 0603R 5514.41,960 r90 top
R127 "250Ω" 0603R 6544.41,965 r90 top
R128 "250Ω" 0603R 7539.41,975 r90 top
R129 "250Ω" 0603R 2624.41,965 r90 top
R130 "250Ω" 0603R 3594.41,965 r90 top
R131 "250Ω" 0603R 694.41,970 r90 top
R132 "250Ω" 0603R 1659.41,965 r90 top
R133 "0Ω/DNP" 0603R 4110,1095 r270 top
R134 "0Ω" 0603R 4615,1010 r0 top
R135 "0Ω" 0603R 4040,1095 r270 top
R136 "0Ω/DNP" 0603R 5074.41,1070 r270 top
R137 "0Ω/DNP" 0603R 6104.41,1075 r270 top
R138 "0Ω" 0603R 5639.33,980 r0 top
R139 "0Ω" 0603R 4999.41,1070 r270 top
R140 "0Ω" 0603R 6669.33,985 r0 top
R141 "0Ω" 0603R 6029.41,1075 r270 top
R142 "0Ω/DNP" 0603R 7099.41,1085 r270 top
R143 "0Ω/DNP" 0603R 2184.41,1075 r270 top
R144 "0Ω/DNP" 0603R 3154.41,1075 r270 top
R145 "0Ω" 0603R 7664.33,995 r0 top
R146 "0Ω/DNP" 0603R 1155,1075 r270 top
R147 "0Ω" 0603R 2749.33,985 r0 top
R148 "0Ω" 0603R 2109.41,1075 r270 top
R149 "0Ω" 0603R 3719.33,985 r0 top
R150 "0Ω" 0603R 7024.41,1085 r270 top
R151 "0Ω" 0603R 254.41,1080 r270 top
R152 "0Ω" 0603R 3079.41,1075 r270 top
R153 "0Ω" 0603R 819.33,990 r0 top
R154 "0Ω" 0603R 1220,1075 r270 top
R155 "0Ω/DNP" 0603R 179.41,1080 r270 top
R156 "0Ω" 0603R 1785,985 r0 top
R157 "510R" 0603R 4989.41,1270 r90 top
R158 "50K" 0603R 4989.41,1395 r90 top
R159 "510R" 0603R 4020,1270 r90 top
R160 "50K" 0603R 4020,1395 r90 top
R161 "510R" 0603R 6019.41,1275 r90 top
R162 "50K" 0603R 6019.41,1400 r90 top
R163 "510R" 0603R 7014.41,1285 r90 top
R164 "50K" 0603R 7014.41,1410 r90 top
R165 "510R" 0603R 1134.41,1275 r90 top
R166 "50K" 0603R 1134.41,1400 r90 top
R167 "510R" 0603R 2099.41,1275 r90 top
R168 "50K" 0603R 2099.41,1400 r90 top
R169 "510R" 0603R 3069.41,1275 r90 top
R170 "50K" 0603R 3069.41,1400 r90 top
R171 "510R" 0603R 169.41,1280 r90 top
R172 "50K" 0603R 169.41,1405 r90 top
R173 "510R" 0603R 4989.41,1570 r90 top
R174 "15K" 0603R 4989.41,1705 r90 top
R175 "510R" 0603R 4020,1565 r90 top
R176 "15K" 0603R 4020,1694.92 r90 top
R177 "510R" 0603R 6019.41,1575 r90 top
R178 "15K" 0603R 6019.41,1710 r90 top
R179 "510R" 0603R 7014.41,1585 r90 top
R180 "15K" 0603R 7014.41,1720 r90 top
R181 "510R" 0603R 1134.41,1575 r90 top
R182 "15K" 0603R 1134.41,1710 r90 top
R183 "510R" 0603R 2099.41,1575 r90 top
R184 "15K" 0603R 2099.41,1710 r90 top
R185 "510R" 0603R 3069.41,1575 r90 top
R186 "15K" 0603R 3069.41,1710 r90 top
R187 "510R" 0603R 5619.41,1265 r90 top
R188 "5K" 0603R 5619.41,1390 r90 top
R189 "510R" 0603R 169.41,1580 r90 top
R190 "15K" 0603R 169.41,1715 r90 top
R191 "510R" 0603R 4635,1270 r90 top
R192 "5K" 0603R 4635,1395 r90 top
R193 "0Ω/DNP" 0603R 5760,1310 r0 top
R194 "510R" 0603R 6649.41,1270 r90 top
R195 "5K" 0603R 6649.41,1395 r90 top
R196 "510R" 0603R 7644.41,1280 r90 top
R197 "5K" 0603R 7644.41,1405 r90 top
R198 "510R" 0603R 1764.41,1270 r90 top
R199 "5K" 0603R 1764.41,1395 r90 top
R200 "510R" 0603R 2729.41,1270 r90 top
R201 "5K" 0603R 2729.41,1395 r90 top
R202 "510R" 0603R 3699.41,1270 r90 top
R203 "5K" 0603R 3699.41,1395 r90 top
R204 "0Ω/DNP" 0603R 4780,1310 r0 top
R205 "0Ω/DNP" 0603R 6790,1315 r0 top
R206 "不焊" 0603R 5619.41,1565.08 r90 top
R207 "510R" 0603R 5619.41,1695 r90 top
R208 "0Ω/DNP" 0603R 7785,1325 r180 top
R209 "510R" 0603R 799.41,1275 r90 top
R210 "5K" 0603R 799.41,1400 r90 top
R211 "0Ω/DNP" 0603R 1905,1315 r0 top
R212 "0Ω/DNP" 0603R 2870,1315 r0 top
R213 "0Ω/DNP" 0603R 3840,1315 r0 top
R214 "不焊" 0603R 4640,1570 r90 top
R215 "510R" 0603R 4640,1700 r90 top
R216 "不焊" 0603R 6649.41,1570.08 r90 top
R217 "510R" 0603R 6649.41,1700 r90 top
R218 "0Ω/DNP" 0603R 5760,1245 r180 top
R219 "不焊" 0603R 7644.41,1580.08 r90 top
R220 "510R" 0603R 7644.41,1710 r90 top
R221 "0Ω/DNP" 0603R 940,1320 r0 top
R222 "不焊" 0603R 1764.41,1570.08 r90 top
R223 "510R" 0603R 1764.41,1700 r90 top
R224 "不焊" 0603R 2729.41,1570.08 r90 top
R225 "510R" 0603R 2729.41,1700 r90 top
R226 "不焊" 0603R 3699.41,1570.08 r90 top
R227 "510R" 0603R 3699.41,1700 r90 top
R228 "0Ω/DNP" 0603R 4780,1240 r180 top
R229 "30M" 0603R 5224.41,1860 r180 top
R230 "0Ω/DNP" 0603R 6790,1250 r180 top
R231 "30M" 0603R 4240,1870 r180 top
R232 "0Ω/DNP" 0603R 7785,1260 r180 top
R233 "不焊" 0603R 799.41,1575.08 r90 top
R234 "510R" 0603R 799.41,1705 r90 top
R235 "0Ω/DNP" 0603R 1905,1250 r180 top
R236 "0Ω/DNP" 0603R 2870,1250 r180 top
R237 "0Ω/DNP" 0603R 3840,1250 r180 top
R238 "30M" 0603R 6254.41,1865 r180 top
R239 "30M" 0603R 7249.41,1875 r180 top
R240 "30M" 0603R 1369.41,1865 r180 top
R241 "30M" 0603R 2334.41,1865 r180 top
R242 "30M" 0603R 3304.41,1865 r180 top
R243 "0Ω/DNP" 0603R 940,1255 r180 top
R244 "510R" 0603R 5319.41,1830 r90 top
R245 "30M" 0603R 404.41,1870 r180 top
R246 "510R" 0603R 4335,1840 r90 top
R247 "510R" 0603R 6349.41,1835 r90 top
R248 "0Ω/DNP" 0603R 4915,859.92 r90 top
R249 "30M" 0603R 5389.41,1830 r270 top
R250 "510R" 0603R 7344.41,1845 r90 top
R251 "510R" 0603R 1464.41,1835 r90 top
R252 "510R" 0603R 2429.41,1835 r90 top
R253 "510R" 0603R 3399.41,1835 r90 top
R254 "0Ω/DNP" 0603R 3975,870 r90 top
R255 "30M" 0603R 4400,1840.08 r270 top
R256 "0Ω/DNP" 0603R 5945,864.92 r90 top
R257 "30M" 0603R 6419.41,1835 r270 top
R258 "0Ω/DNP" 0603R 6940,874.92 r90 top
R259 "30M" 0603R 7414.41,1845 r270 top
R260 "510R" 0603R 499.41,1840 r90 top
R261 "0Ω/DNP" 0603R 1060,864.92 r90 top
R262 "30M" 0603R 1534.41,1835 r270 top
R263 "0Ω/DNP" 0603R 2025,864.92 r90 top
R264 "30M" 0603R 2499.41,1835 r270 top
R265 "0Ω/DNP" 0603R 2995,864.92 r90 top
R266 "30M" 0603R 3469.41,1835 r270 top
R267 "0Ω/DNP" 0603R 95,869.92 r90 top
R268 "30M" 0603R 569.41,1840 r270 top
Rg1 "5.49K" 0603R 4305,810 r180 top
Rg2 "5.49K" 0603R 5299.41,800 r180 top
Rg3 "5.49K" 0603R 6329.41,805 r180 top
Rg4 "5.49K" 0603R 7324.41,815 r180 top
Rg5 "5.49K" 0603R 2409.41,805 r180 top
Rg6 "5.49K" 0603R 3379.41,805 r180 top
Rg7 "5.49K" 0603R 479.41,810 r180 top
Rg8 "5.49K" 0603R 1444.41,805 r180 top
SW1 "SW-1P" "CSW DIP-1P" 715,6315 r180 top
SW2 "2MS1T2B2VS2QES" SW-TH_2MS1T2B2VS2QES 390,8545 r180 top
SW3 "DSWB02LHGET" "CSW DIP-2P" 4040,8720 r0 top
SW4 "SW_PB_ESW" "TSW SMD-6*6*4.3" 2725,8905 r0 top
T1 "TEST POINT" TEST 1920,4680 r270 top
U1 "TPS7A4701" PCBComponent_1 1514.41,3183.48 r0 top
U2 "TPS7A3301" PCBComponent_1 1565,2690 r0 top
U3 "TP6327GS6" SOT-23-6 1362.87,6912.95 r270 top
U4 "TP6327GS6" SOT-23-6 1377.4,7435 r270 top
U5 "TP6327GS6" SOT-23-6 1404.8,6130 r270 top
U6 "ref2030aiddcr" SOT-23-5_L2.9-W1.6-P0.95-LS2.8-BL 3515,4645 r90 top
U7 "opa192idbvr" SOT-23-5_L3.0-W1.7-P0.95-LS2.8-BL 3845,4635 r270 top
U8 "URA2412S-6WR3" PWRM-TH_URAXXXXS-6WR3 300,7335 r270 top value=500kHz
U9 "pc817x2csp9f" SMD-4_L4.6-W6.5-P2.54-LS10.2-TL 5470,8190 r90 top
U10 "lp5907mfx-3.3/nopb" SOT-23-5_L3.0-W1.7-P0.95-LS2.8-BR 1765,5090 r90 top
U11 "AMS1117-3.3_C6186" SOT-223-3_L6.5-W3.4-P2.30-LS7.0-BR 1910,7160 r270 top
U12 "adau1979wbcpz-rl" QFN-40_L6.0-W6.0-P0.50-TL-EP4.1 2510,4885 r180 top
U13 "ura2415ymd-15wr3" PWRM-TH_URA2415YMD-15WR3 550,3830 r270 top
U14 "TJA1057GT3_8P" SOIC-8 7425,6930 r270 top
U15 "VP811" SOT-143 2740,8615 r270 top
U16 "RTL8211E-VB" QFN-48_L6.0-W6.0-P0.40-BL-EP3.8 6395,4740 r90 top
U17 "adau1979wbcpz-rl" QFN-40_L6.0-W6.0-P0.50-TL-EP4.1 4550,4900 r180 top
U18 "MAX3485" SOIC-8 6760,7415 r0 top
U19 "ISO7221AD" SOIC-8 6365,3545 r270 top
U20 "CH340C" SOP-16 7035,3480 r270 top
U21 "LT1167" SO-8 4425,910 r180 top
U22 "LT1167" SO-8 5404.41,885 r180 top
U23 "LT1167" SO-8 6434.41,890 r180 top
U24 "LT1167" SO-8 7429.41,900 r180 top
U25 "LT1167" SO-8 3484.41,890 r180 top
U26 "LT1167" SO-8 2514.41,890 r180 top
U27 "LT1167" SO-8 584.41,895 r180 top
U28 "LT1167" SO-8 1549.41,890 r180 top
U29 "LT1793" SOP-8 5214.41,1945 r90 top
U30 "LT1793" SOP-8 4220,1950 r90 top
U31 "LT1793" SOP-8 6244.41,1950 r90 top
U32 "LT1793" SOP-8 7239.41,1960 r90 top
U33 "LT1793" SOP-8 1359.41,1950 r90 top
U34 "LT1793" SOP-8 2324.41,1950 r90 top
U35 "LT1793" SOP-8 3294.41,1950 r90 top
U36 "LT1793" SOP-8 394.41,1955 r90 top
U37 "dg201BDY" dg201BDY 2409.41,1505 r90 top
U38 "dg201BDY" dg201BDY 1444.41,1505 r90 top
U39 "dg201BDY" dg201BDY 3379.41,1505 r90 top
U40 "dg201BDY" dg201BDY 7324.41,1515 r90 top
U41 "dg201BDY" dg201BDY 479.41,1510 r90 top
U42 "dg201BDY" dg201BDY 4322.7,1505 r90 top
U43 "dg201BDY" dg201BDY 5299.41,1500 r90 top
U44 "dg201BDY" dg201BDY 6329.41,1505 r90 top
USBC1 "TYPE-C-31-M-12" USB-C_SMD-TYPE-C-31-M-12_1 7675,3300 r90 top
Y1 "25MHz" SMD3225-4P 6395,4350 r180 top

## Footprints (in the part's own frame and the unit in brackets; to place one, negate y for a bottom-side part, rotate by r counter-clockwise, add the part's x,y. Pads: shape width x height; smd on the part's side, far side on the other; paste and mask are expansions set on the pad)
2pin [mm]
  round 1.8 hole 0.9: 1(0,1.27) 2(0,-1.27)
  silkscreen extent -1.27,-2.67 1.27,2.54
5x11mm [mm]
  round 1.3 hole 0.8: 1(-1.016,0) 2(0.984,0)
  silkscreen extent -2.52,-2.5 2.48,2.5
0603 [mm]
  rect 0.7x0.9 smd: 1(-0.75,0) 2(0.75,0)
  silkscreen extent -0.2,-0.35 0.2,0.35, body extent -0.83,-0.4 0.77,0.4, height 0.4
0603C#1 [mm]
  rect 0.76x0.8 smd: 1(-0.76,0) 2(0.76,0)
  silkscreen extent -1.46,-0.7 1.46,0.7
0603C#2 [mm]
  rect 0.76x0.8 smd: 1(-0.76,0) SS(0.76,0)
  silkscreen extent -1.46,-0.7 1.46,0.7
0603R [mm]
  rect 0.76x0.8 smd: 1(-0.76,0) 2(0.76,0)
  silkscreen extent -1.46,-0.7 1.46,0.7
1210L [mm]
  rect 1.5x2.5 smd: 1(-1.4,0) 2(1.4,0)
  silkscreen extent -2.2,-1.55 2.2,1.55
1812 [mil]
  rect 60x125 smd: 1(-92.5,0) 2(92.5,0)
  silkscreen extent -143,-85 143,85, body extent -87,-64 91,62, height 22
C1206 [mil]
  rect 58.5x68 smd paste-3937 mask+2: 1(-62.7,0) 2(62.7,0)
  silkscreen extent -101,-43 101,43
C1210 [mm]
  rect 1.635x2.7 smd paste-100 mask+0.051: 1(-1.517,0) 2(1.517,0)
  silkscreen extent -2.56,-1.58 2.56,1.58
"C 0603_L" [mil] "无极性贴片电容                                       淘宝ID:黄晶宝石"
  rect 30x30 smd: 1(-25.59,0) 2(25.59,0)
  silkscreen extent -51,-26 51,26, body extent -31,-16 31,16, height 32
"C 0805_L" [mil] "无极性贴片电容                                        淘宝ID:黄晶宝石"
  rect 35x50 smd: 1(-37.4,0) 2(37.4,0)
  silkscreen extent -67,-36 67,36, body extent -39,-24 39,24, height 20
CAP-TH_BD6.3-P2.50-D0.6-FD [mm]
  round 1.75 hole 1.1 paste-2539.97 mask+0.05: 1(-1.25,0) 2(1.25,0)
  silkscreen extent -3.15,-3.15 3.21,3.15
CAP-TH_BD8.0-P3.50-D0.6-FD [mm]
  round 1.6 hole 1: 1(-1.75,0) 2(1.75,0)
  silkscreen extent -3.96,-4 4.04,4
CAP-TH_BD8.0-P3.50-D0.6-FD_1 [mm]
  round 1.6 hole 1 paste-2539.97 mask+0.051: 1(-1.75,0) 2(1.75,0)
  silkscreen extent -3.96,-4 4.04,4
CAP-TH_BD10.0-P5.00-D1.0-FD [mm]
  round 1.6 hole 1: 1(-2.54,0) 2(2.54,0)
  silkscreen extent -5,-5 5.08,5
CAP-TH_BD13.0-P5.00-D1.2-FD [mm]
  round 2 hole 1.2: 1(-2.54,0) 2(2.54,0)
  silkscreen extent -6.5,-6.5 6.5,6.5
"CM D(6.3*5.4)" [mm] "贴片电解电容，直径6.3mm，高5.4mm           淘宝ID:黄晶宝石"
  rect 2.7x1 smd: 1(3,0)
  oval 2.7x1 smd: 2(-3,0)
  silkscreen extent -3.3,-3.3 3.3,3.3, body extent -3.5,-3.3 3.5,3.3, height 5.4
CONN-SMD_60P-P0.50_SGDBF-05-60P_1 [mm]
  rect 0.25x2 smd paste+0 mask+0.051: 1(16.1,0.2) 2(16.1,4.2) 3(15.6,0.2) 4(15.6,4.2) 5(15.1,0.2) 6(15.1,4.2) 7(14.6,0.2) 8(14.6,4.2) 9(14.1,0.2) 10(14.1,4.2) 11(13.6,0.2) 12(13.6,4.2) 13(13.1,0.2) 14(13.1,4.2) 15(12.6,0.2) 16(12.6,4.2) 17(12.1,0.2) 18(12.1,4.2) 19(11.6,0.2) 20(11.6,4.2) 21(11.1,0.2) 22(11.1,4.2) 23(10.6,0.2) 24(10.6,4.2) 25(10.1,0.2) 26(10.1,4.2) 27(9.6,0.2) 28(9.6,4.2) 29(9.1,0.2) 30(9.1,4.2) 31(8.6,0.2) 32(8.6,4.2) 33(8.1,0.2) 34(8.1,4.2) 35(7.6,0.2) 36(7.6,4.2) 37(7.1,0.2) 38(7.1,4.2) 39(6.6,0.2) 40(6.6,4.2) 41(6.1,0.2) 42(6.1,4.2) 43(5.6,0.2) 44(5.6,4.2) 45(5.1,0.2) 46(5.1,4.2) 47(4.6,0.2) 48(4.6,4.2) 49(4.1,0.2) 50(4.1,4.2) 51(3.6,0.2) 52(3.6,4.2) 53(3.1,0.2) 54(3.1,4.2) 55(2.6,0.2) 56(2.6,4.2) 57(2.1,0.2) 58(2.1,4.2) 59(1.6,0.2) 60(1.6,4.2)
  round 0.4 on Top Overlay: 1(16.15,-1.45)
  round 0.65 hole 0.65 unplated paste-2539.97: ""(0.65,0.95) ""(17.05,0.95)
  silkscreen extent 0,-0.8 17.7,5.2
CONN-SMD_60P-P0.50_SGDBM-05-60P_1 [mm]
  rect 0.25x2 smd paste+0 mask+0.051: 1(16.113,-0.2) 2(16.113,-4.2) 3(15.613,-0.2) 4(15.613,-4.2) 5(15.113,-0.2) 6(15.113,-4.2) 7(14.613,-0.2) 8(14.613,-4.2) 9(14.113,-0.2) 10(14.113,-4.2) 11(13.613,-0.2) 12(13.613,-4.2) 13(13.113,-0.2) 14(13.113,-4.2) 15(12.613,-0.2) 16(12.613,-4.2) 17(12.113,-0.2) 18(12.113,-4.2) 19(11.613,-0.2) 20(11.613,-4.2) 21(11.113,-0.2) 22(11.113,-4.2) 23(10.613,-0.2) 24(10.613,-4.2) 25(10.113,-0.2) 26(10.113,-4.2) 27(9.613,-0.2) 28(9.613,-4.2) 29(9.113,-0.2) 30(9.113,-4.2) 31(8.613,-0.2) 32(8.613,-4.2) 33(8.113,-0.2) 34(8.113,-4.2) 35(7.613,-0.2) 36(7.613,-4.2) 37(7.113,-0.2) 38(7.113,-4.2) 39(6.613,-0.2) 40(6.613,-4.2) 41(6.113,-0.2) 42(6.113,-4.2) 43(5.613,-0.2) 44(5.613,-4.2) 45(5.113,-0.2) 46(5.113,-4.2) 47(4.613,-0.2) 48(4.613,-4.2) 49(4.113,-0.2) 50(4.113,-4.2) 51(3.613,-0.2) 52(3.613,-4.2) 53(3.113,-0.2) 54(3.113,-4.2) 55(2.613,-0.2) 56(2.613,-4.2) 57(2.113,-0.2) 58(2.113,-4.2) 59(1.613,-0.2) 60(1.613,-4.2)
  round 0.4 on Top Overlay: 1(16.163,1.4)
  round 0.65 hole 0.65 unplated paste-2539.97: ""(0.663,-0.95) ""(17.063,-0.95)
  silkscreen extent 0.01,-5.2 17.71,0.8
CONN-TH_2P-P5.08 [mm]
  round 2.2 hole 1.3 paste-2539.97 mask+0.051: 1(-2.54,0) 2(2.54,0)
  silkscreen extent -5.72,-4.1 5.08,4.1
CONN-TH_3P-P5.00_WJ500V-5.08-3P [mm]
  round 2 hole 1.3: 1(-5.08,0) 2(0,0) 3(5.08,0)
  silkscreen extent -7.64,-5.53 8.15,4.5
"CSW DIP-1P" [mm] "4.1*9.9*7mm           淘宝ID:黄晶宝石"
  rect 1.7x1.7 hole 0.9: 1(0,-3.81)
  round 1.7 hole 0.9: 2(0,3.81)
  silkscreen extent -2.16,-5.08 2.16,4.95, body extent -2.05,-4.95 2.05,4.95, height 6.65
"CSW DIP-2P" [mm] "6.6*9.9*7mm"
  rect 1.7x1.7 hole 0.9: 1(-1.27,-3.81)
  round 1.7 hole 0.9: 2(1.27,-3.81) 3(1.27,3.81) 4(-1.27,3.81)
  silkscreen extent -3.43,-5.08 3.43,4.95, body extent -3.32,-4.95 3.32,4.95, height 6.65
DC-005 [mm] "5.5*2.1mm，DC30V,2.5A      淘宝ID:黄晶宝石"
  rect 2x4 hole 0.8 slot 3 at 90 deg: 1(-6.2,0) 2(0,0)
  rect 4x2 hole 0.8 slot 2.5 at 0 deg: 3(-3.5,4.7)
  silkscreen extent -5.48,-4.5 7.5,4.5, body extent -6.55,-4.5 7.5,4.8, height 11.2
dg201BDY [mil]
  oval 23.7x77.6 smd paste+2 mask+4: 1(-175,-107.7) 2(-125,-107.7) 3(-75,-107.7) 4(-25,-107.7) 5(25,-107.7) 6(75,-107.7) 7(125,-107.7) 8(175,-107.7) 9(175,107.7) 10(125,107.7) 11(75,107.7) 12(25,107.7) 13(-25,107.7) 14(-75,107.7) 15(-125,107.7) 16(-175,107.7)
  silkscreen extent -211,-111 198,60
FUSE-TH_L13.0-W3.1-P5.10-D0.8-S1.40 [mm]
  round 1.8 hole 1.2: 1(-2.55,0.7) 2(2.55,-0.7)
  silkscreen extent -6.5,-1.55 6.5,1.55
HDR2.54-LI-2x3P [mm] "封装库来自淘宝卖家 ID：黄晶宝石"
  rect 1.6x1.6 hole 0.9: 1(-2.54,-1.27)
  round 1.6 hole 0.9: 2(-2.54,1.27) 3(0,-1.27) 4(0,1.27) 5(2.54,-1.27) 6(2.54,1.27)
  silkscreen extent -3.81,-2.54 3.81,2.54, body extent -3.81,-2.54 3.81,2.54, height 8.5
HDR2.54-LI-2x5P [mm] "双排排针，5x2脚 淘宝ID:黄晶宝石   店铺网址:https://shop463601444.taobao.com"
  rect 1.6x1.6 hole 0.9: 1(-5.08,-1.27)
  round 1.6 hole 0.9: 2(-5.08,1.27) 3(-2.54,-1.27) 4(-2.54,1.27) 5(0,-1.27) 6(0,1.27) 7(2.54,-1.27) 8(2.54,1.27) 9(5.08,-1.27) 10(5.08,1.27)
  silkscreen extent -6.35,-2.54 6.35,2.54, body extent -6.35,-2.54 6.35,2.54, height 8.5
HDR2.54-Y-LI-2P [mm] "圆孔排母，2脚"
  rect 1.7x1.7 hole 0.9: 1(-1.27,0)
  round 1.7 hole 0.9: 2(1.27,0)
  silkscreen extent -2.67,-1.27 2.67,1.27, body extent -2.54,-1.27 2.54,1.27, height 4.31
HDR2X2_B [mm] "Connector; Header; 2 Position"
  rect 1.5x1.5 hole 0.9: 1(0,0)
  round 1.5 hole 0.9: 2(2.54,0) 3(0,-2.54) 4(2.54,-2.54)
  silkscreen extent -1.27,-3.81 3.81,1.27
IDC2.54-LI-2x12P [mm] "24P简易牛角座"
  rect 1.6x1.6 hole 0.9: 1(0,0)
  round 1.6 hole 0.9: 2(0,2.54) 3(2.54,0) 4(2.54,2.54) 5(5.08,0) 6(5.08,2.54) 7(7.62,0) 8(7.62,2.54) 9(10.16,0) 10(10.16,2.54) 11(12.7,0) 12(12.7,2.54) 13(15.24,0) 14(15.24,2.54) 15(17.78,0) 16(17.78,2.54) 17(20.32,0) 18(20.32,2.54) 19(22.86,0) 20(22.86,2.54) 21(25.4,0) 22(25.4,2.54) 23(27.94,0) 24(27.94,2.54)
  silkscreen extent -5.11,-3.23 33.05,5.77, body extent -5.08,-3.08 33.02,5.77, height 9.17
IND-SMD_L6.0-W6.0 [mm]
  rect 2.2x5.72 smd: 1(-2.5,0) 2(2.5,0)
  silkscreen extent -3.18,-3.18 3.18,3.18
KF128-5.08-2P [mm] "螺钉式接线端子，脚距5.08mm"
  oval 2.5x3.5 hole 1.2: 1(-2.54,0) 2(2.54,0)
  silkscreen extent -5.59,-5.31 5.08,5.21, body extent -5.58,-5.3 5.08,5.2, height 14.15
L0603 [mil]
  rect 31.5x34 smd paste-3937 mask+2: 1(-27.6,0) 2(27.5,0)
  silkscreen extent -56,-26 56,26
L1206 [mm]
  rect 1.485x1.728 smd paste-100 mask+0.051: 1(-1.593,0) 2(1.593,0)
  silkscreen extent -2.56,-1.09 2.56,1.09
"L 0603" [mil] "小功率贴片电感        淘宝ID:黄晶宝石"
  rect 35x35 smd: 1(-35,0) 2(35,0)
  silkscreen extent -65,-25 65,25, body extent -31,-16 31,16, height 31
"L 0805" [mil] "小功率贴片电感        淘宝ID:黄晶宝石"
  rect 40x55 smd: 1(-45,0) 2(45,0)
  silkscreen extent -75,-35 75,35, body extent -39,-24 39,24, height 35
"LED 0805R" [mil] "红色0805LED                                       淘宝ID:黄晶宝石"
  rect 60x50 smd: 1(-50,0)
  oct 60x50 smd: 2(50,0)
  silkscreen extent -90,-35 105,35, body extent -39,-25 39,25, height 32
OSC-SMD_4P-L3.2-W2.5-BL [mil]
  rect 55.1x47.2 smd: 1(-43.3,-34.5) 2(43.3,-34.5) 3(43.3,34.4) 4(-43.3,34.4)
  silkscreen extent -90,-75 82,68
PCBComponent_1 [mm]
  oval 1.087x0.364 smd paste-100 mask+0.051: 1(-2.454,1.338) 2(-2.454,0.688) 3(-2.454,0.039) 4(-2.454,-0.611) 5(-2.454,-1.261) 11(2.483,-1.261) 12(2.483,-0.611) 13(2.483,0.039) 14(2.483,0.688) 15(2.483,1.338)
  oval 0.364x1.087 smd paste-100 mask+0.051: 6(-1.285,-2.43) 7(-0.635,-2.43) 8(0.015,-2.43) 9(0.665,-2.43) 10(1.315,-2.43) 16(1.315,2.507) 17(0.665,2.507) 18(0.015,2.507) 19(-0.635,2.507) 20(-1.285,2.507)
  rect 3.15x3.15 smd paste-100 mask+0.051: 21(0.015,0.039)
  silkscreen extent -3.37,-2.54 2.59,2.61
PWRM-TH_URA2415YMD-15WR3 [mm]
  round 2 hole 1.5: 1(-10.16,10.16) 2(-10.16,2.54) 3(-10.16,-2.54) 4(10.16,-10.16) 5(10.16,0) 6(10.16,10.16)
  silkscreen extent -12.7,-12.7 12.7,12.7
PWRM-TH_URAXXXXS-6WR3 [mm]
  round 1.8 hole 1.2: 1(-8.89,0) 2(-6.35,0) 3(-3.81,0) 5(1.27,0) 6(3.81,0) 7(6.35,0) 8(8.89,0)
  silkscreen extent -11,-6.8 11,2.7
QFN-40_L6.0-W6.0-P0.50-TL-EP4.1 [mil]
  rect 31.5x11 smd paste-3937 mask+2: 1(-118.1,88.5) 2(-118.1,68.9) 3(-118.1,49.2) 4(-118.1,29.5) 5(-118.1,9.8) 6(-118.1,-9.9) 7(-118.1,-29.6) 8(-118.1,-49.3) 9(-118.1,-68.9) 10(-118.1,-88.6) 21(118.1,-88.6) 22(118.1,-68.9) 23(118.1,-49.3) 24(118.1,-29.6) 25(118.1,-9.9) 26(118.1,9.8) 27(118.1,29.5) 28(118.1,49.2) 29(118.1,68.9) 30(118.1,88.5)
  rect 11x31.5 smd paste-3937 mask+2: 11(-88.6,-118.2) 12(-68.9,-118.2) 13(-49.2,-118.2) 14(-29.5,-118.2) 15(-9.8,-118.2) 16(9.9,-118.2) 17(29.5,-118.2) 18(49.2,-118.2) 19(68.9,-118.2) 20(88.6,-118.2) 31(88.6,118.1) 32(68.9,118.1) 33(49.2,118.1) 34(29.5,118.1) 35(9.9,118.1) 36(-9.8,118.1) 37(-29.5,118.1) 38(-49.2,118.1) 39(-68.9,118.1) 40(-88.6,118.1)
  rect 161.4x161.4 smd paste-3937 mask+2: 41(0,0)
  silkscreen extent -156,-126 126,126
QFN-48_L6.0-W6.0-P0.40-BL-EP3.8 [mm]
  rect 0.2x0.665 smd paste-100 mask+0.051: 1(-2.2,-2.908) 2(-1.8,-2.908) 3(-1.4,-2.908) 4(-1,-2.908) 5(-0.6,-2.908) 6(-0.2,-2.908) 7(0.2,-2.908) 8(0.6,-2.908) 9(1,-2.908) 10(1.4,-2.908) 11(1.8,-2.908) 12(2.2,-2.908) 25(2.2,2.908) 26(1.8,2.908) 27(1.4,2.908) 28(1,2.908) 29(0.6,2.908) 30(0.2,2.908) 31(-0.2,2.908) 32(-0.6,2.908) 33(-1,2.908) 34(-1.4,2.908) 35(-1.8,2.908) 36(-2.2,2.908)
  rect 0.665x0.2 smd paste-100 mask+0.051: 13(2.908,-2.2) 14(2.908,-1.8) 15(2.908,-1.4) 16(2.908,-1) 17(2.908,-0.6) 18(2.908,-0.2) 19(2.908,0.2) 20(2.908,0.6) 21(2.908,1) 22(2.908,1.4) 23(2.908,1.8) 24(2.908,2.2) 37(-2.908,2.2) 38(-2.908,1.8) 39(-2.908,1.4) 40(-2.908,1) 41(-2.908,0.6) 42(-2.908,0.2) 43(-2.908,-0.2) 44(-2.908,-0.6) 45(-2.908,-1) 46(-2.908,-1.4) 47(-2.908,-1.8) 48(-2.908,-2.2)
  rect 3.8x3.8 smd paste-100 mask+0.051: 49(0,0)
  silkscreen extent -3.08,-3.61 3.08,3.08
"R 0603_L" [mil] "1/10W贴片电阻                 淘宝ID:黄晶宝石"
  rect 30x30 smd: 1(-25.59,0) 2(25.59,0)
  silkscreen extent -51,-26 51,26, body extent -31,-16 32,16, height 16
RES-TH_L16.5-W3.5-P7.50-D0.8-S2.10 [mm]
  round 2 hole 1.2: 1(-3.749,1.05) 2(3.749,-1.05)
  silkscreen extent -8.25,-1.78 8.26,1.91
RJ45-TH_10P-P2.54-S2.54_L16.1-W21.4_HY911130A [mil]
  round 61 hole 40: 1(-308.48,377.48) 2(-258.48,277.48) 3(-208.48,377.48) 4(-158.48,277.48) 5(-108.48,377.48) 6(-58.48,277.48) 7(-8.48,377.48) 8(41.52,277.48) 9(91.52,377.48) 10(141.52,277.48)
  round 61 hole 48: 11(-344.11,-165.44) 12(-244.11,-165.44) 13(77.55,-165.44) 14(177.55,-165.44)
  round 101.6 hole 72: 15(-388.2,147.55) 16(221.64,147.55)
  Keep-Out Layer board cut-out: 205.69,21.17 203.23,8.81 198.41,-2.83 191.41,-13.31 182.5,-22.22 172.02,-29.22 160.38,-34.04 148.02,-36.5 135.41,-36.5 123.05,-34.04 111.41,-29.22 100.93,-22.22 92.02,-13.31 85.02,-2.83 80.2,8.81 77.74,21.17 77.74,33.78 80.2,46.14 85.02,57.78 92.02,68.26 100.93,77.17 111.41,84.17 123.05,88.99 135.41,91.45 148.02,91.45 160.38,88.99 172.02,84.17 182.5,77.17 191.41,68.26 198.41,57.78 203.23,46.14 205.69,33.78
  Keep-Out Layer board cut-out: -244.31,21.17 -246.77,8.81 -251.59,-2.83 -258.59,-13.31 -267.5,-22.22 -277.98,-29.22 -289.62,-34.04 -301.98,-36.5 -314.59,-36.5 -326.95,-34.04 -338.59,-29.22 -349.07,-22.22 -357.98,-13.31 -364.98,-2.83 -369.8,8.81 -372.26,21.17 -372.26,33.78 -369.8,46.14 -364.98,57.78 -357.98,68.26 -349.07,77.17 -338.59,84.17 -326.95,88.99 -314.59,91.45 -301.98,91.45 -289.62,88.99 -277.98,84.17 -267.5,77.17 -258.59,68.26 -251.59,57.78 -246.77,46.14 -244.31,33.78
  Keep-Out Layer circle w1: c141.72,27.48 r63.98
  Keep-Out Layer circle w1: c-308.28,27.48 r63.98
  Keep-Out Layer region: 205.69,21.17 203.23,8.81 198.41,-2.83 191.41,-13.31 182.5,-22.22 172.02,-29.22 160.38,-34.04 148.02,-36.5 135.41,-36.5 123.05,-34.04 111.41,-29.22 100.93,-22.22 92.02,-13.31 85.02,-2.83 80.2,8.81 77.74,21.17 77.74,33.78 80.2,46.14 85.02,57.78 92.02,68.26 100.93,77.17 111.41,84.17 123.05,88.99 135.41,91.45 148.02,91.45 160.38,88.99 172.02,84.17 182.5,77.17 191.41,68.26 198.41,57.78 203.23,46.14 205.69,33.78
  Keep-Out Layer region: -244.31,21.17 -246.77,8.81 -251.59,-2.83 -258.59,-13.31 -267.5,-22.22 -277.98,-29.22 -289.62,-34.04 -301.98,-36.5 -314.59,-36.5 -326.95,-34.04 -338.59,-29.22 -349.07,-22.22 -357.98,-13.31 -364.98,-2.83 -369.8,8.81 -372.26,21.17 -372.26,33.78 -369.8,46.14 -364.98,57.78 -357.98,68.26 -349.07,77.17 -338.59,84.17 -326.95,88.99 -314.59,91.45 -301.98,91.45 -289.62,88.99 -277.98,84.17 -267.5,77.17 -258.59,68.26 -251.59,57.78 -246.77,46.14 -244.31,33.78
  silkscreen extent -399,-402 237,437
SMA [mm] "4.5x2.6*2.2mm（长宽高，不包括引脚）"
  rect 2.2x1.75 smd: 1(-2.3,0) 2(2.3,0)
  silkscreen extent -2.7,-1.52 3.56,1.52, body extent -2.53,-1.3 2.58,1.3, height 2.15
SMA_L4.4-W2.8-LS5.4-RD [mil]
  rect 80.57x63.78 smd paste+0 mask+2: 1(-101,0) 2(101,0)
  silkscreen extent -121,-57 106,57
SMB_L4.6-W3.6-LS5.3-RD [mil]
  rect 80.61x86.31 smd: 1(-92.94,0) 2(92.94,0)
  silkscreen extent -123,-77 108,77
SMD3225-4P [mm]
  rect 1.4x1.2 smd: 1(-1.27,-1.184) 2(1.27,-1.184) 3(1.27,1.016) 4(-1.27,1.016)
  silkscreen extent -2.72,-2.31 2.5,1.52
SMD-4_L4.6-W6.5-P2.54-LS10.2-TL [mm]
  rect 2x1.5 smd: 1(-4.65,1.27) 2(-4.65,-1.27) 3(4.65,-1.27) 4(4.65,1.27)
  silkscreen extent -5,-2.3 3.25,2.8
SO-8 [mil] "封装库来自淘宝卖家 ID：黄晶宝石"
  rect 80x24 smd: 1(0,0)
  oval 80x24 smd: 2(0,-50) 3(0,-100) 4(0,-150) 5(220,-150) 6(220,-100) 7(220,-50) 8(220,0)
  silkscreen extent 60,-175 160,25
SOIC-8 [mil]
  oval 88x24 smd: 1(0,0) 2(0,-50) 3(0,-100) 4(0,-150) 5(320,-150) 6(320,-100) 7(320,-50) 8(320,0)
  silkscreen extent 60,-180 260,30, body extent -5,-181 325,31, height 91
SOP-8 [mil]
  oval 80x24 smd: 1(0,0) 2(0,-50) 3(0,-100) 4(0,-150) 5(220,-150) 6(220,-100) 7(220,-50) 8(220,0)
  silkscreen extent 60,-175 160,25